# Altium PCB 1700-0002_InterfaceBoard_RevA.PcbDoc (part 1 of 2)
Units mil, origin at the board's own origin, x right, y up, seen from the top; angles counter-clockwise.
Board outline 3850 x 4150 mil, 4 copper layers (Top, GND+Signal, PWR+Signal, Bottom), stack 69.687 mil thick; 247 components, 140 nets, 790 pads, 277 vias.
Unrouted connection lines stored in the file: 103.
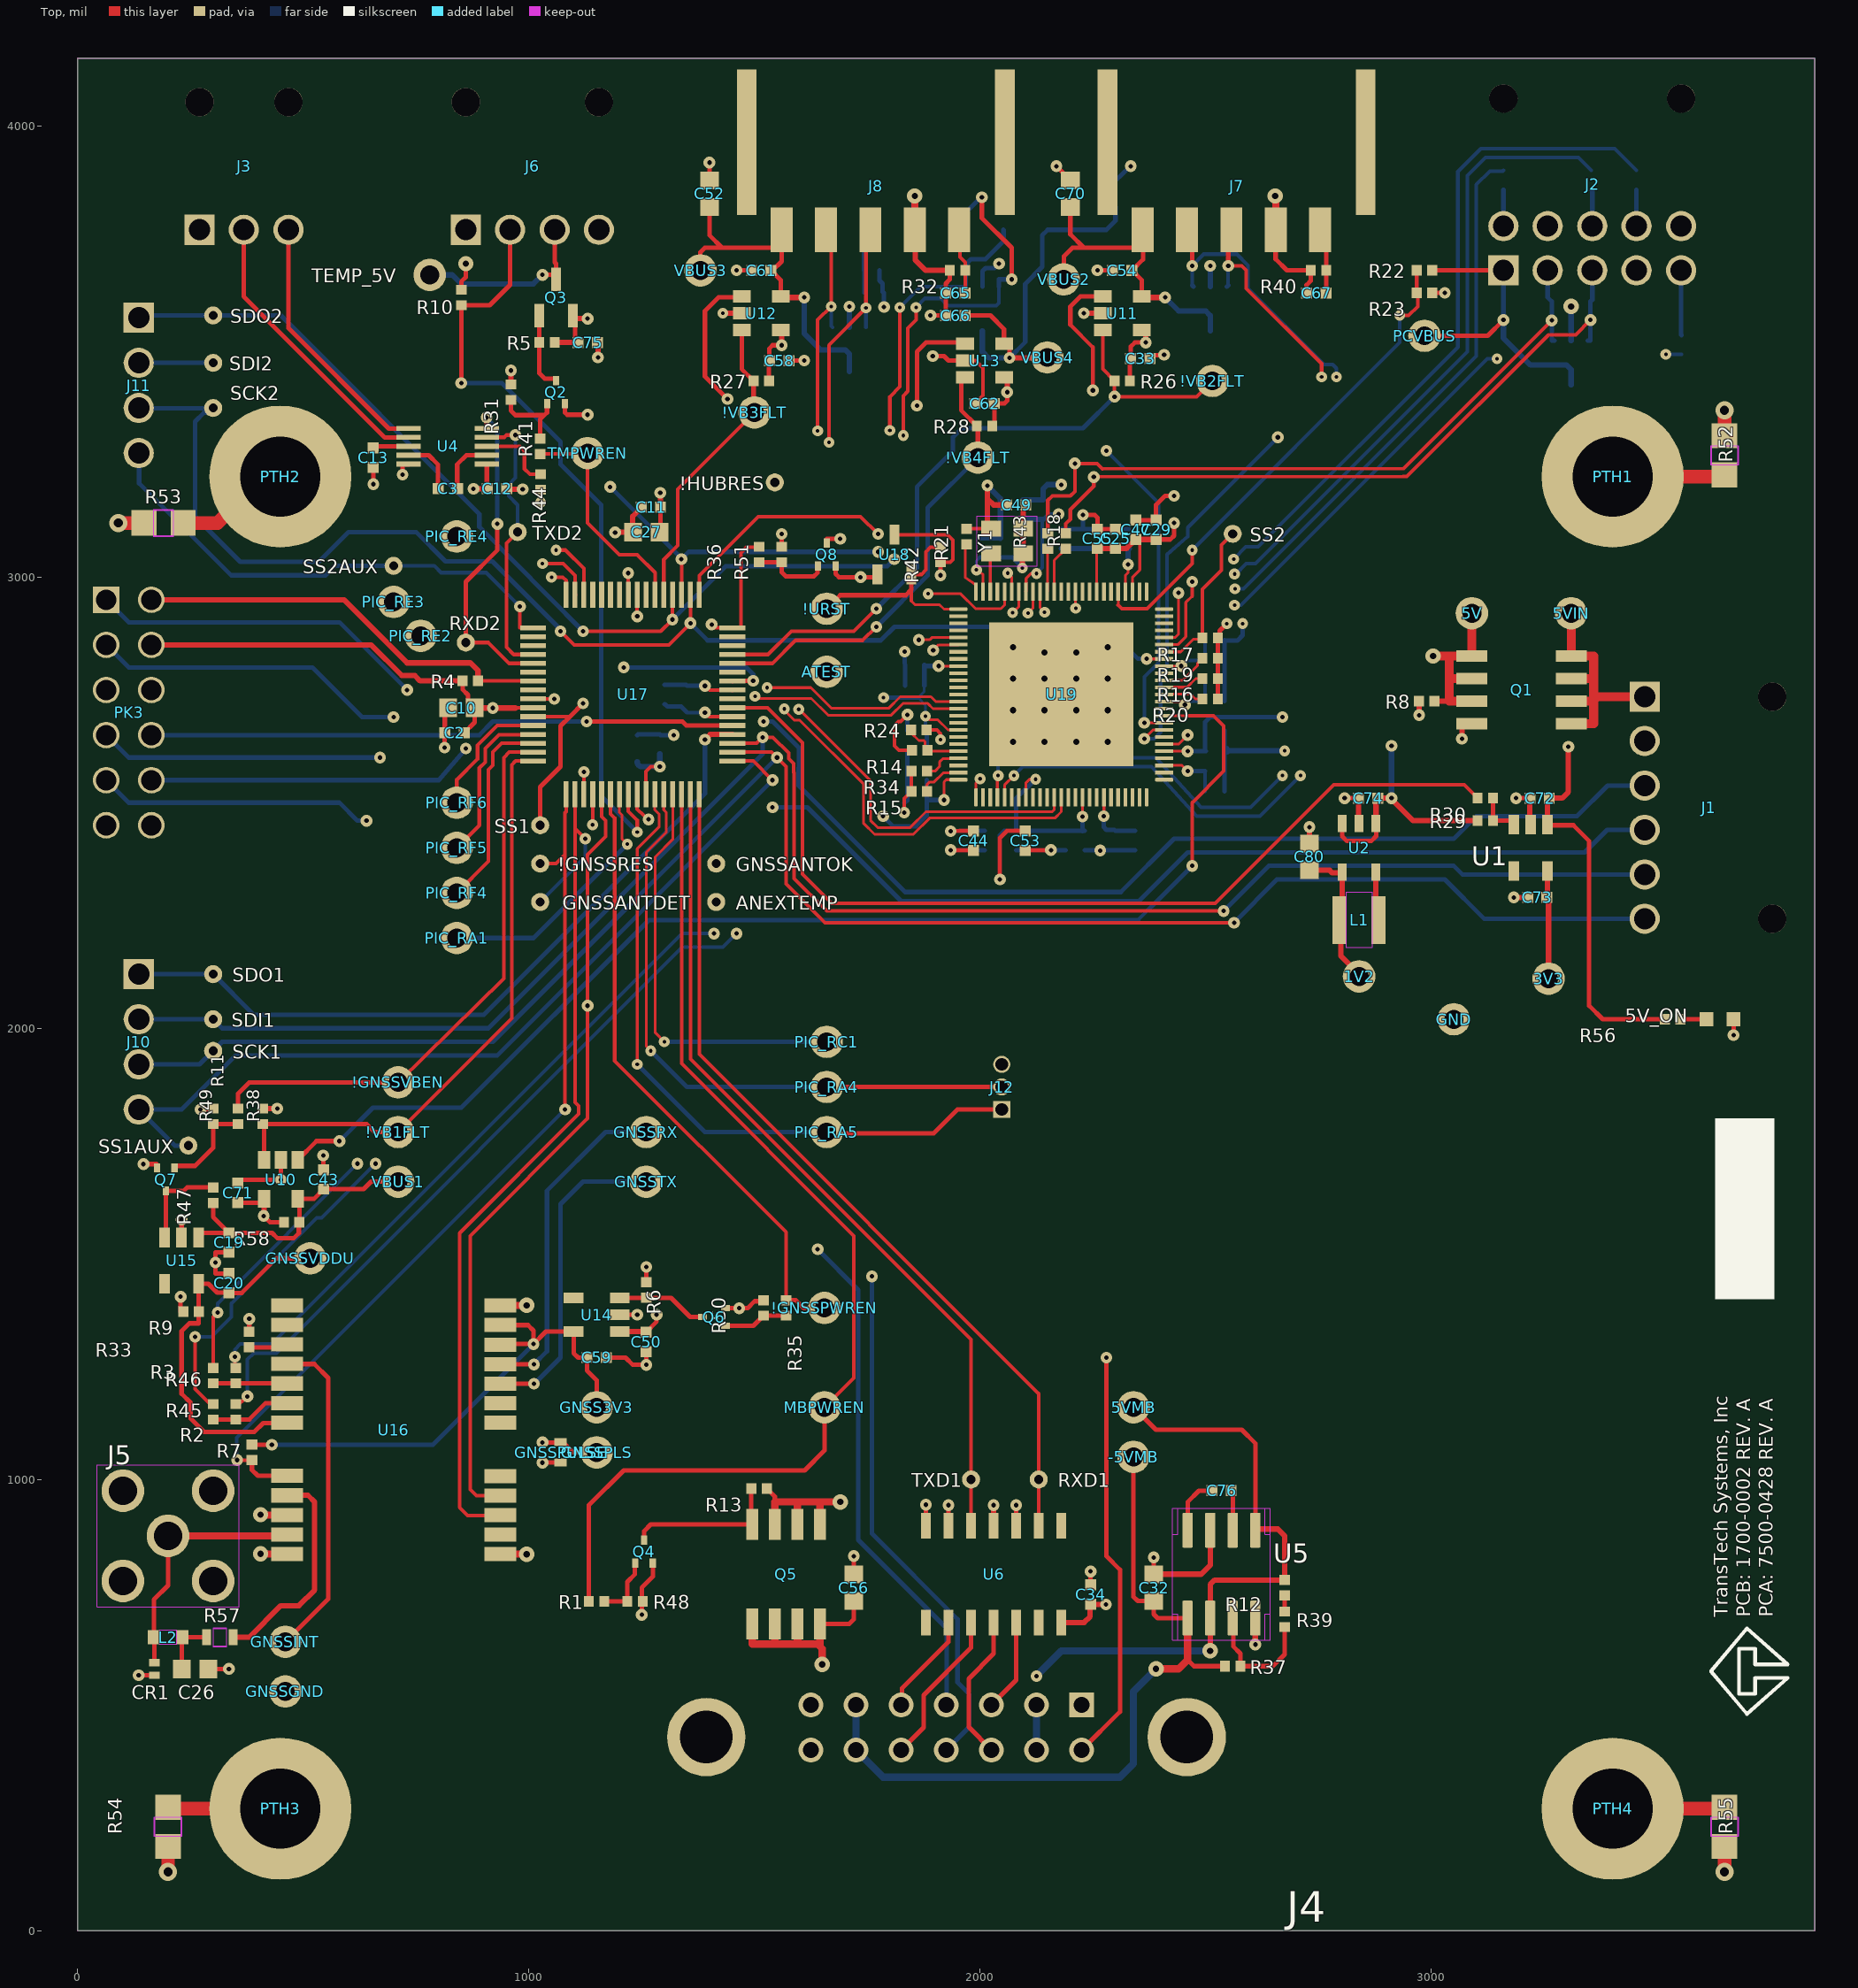
[diagram p0: Top view]
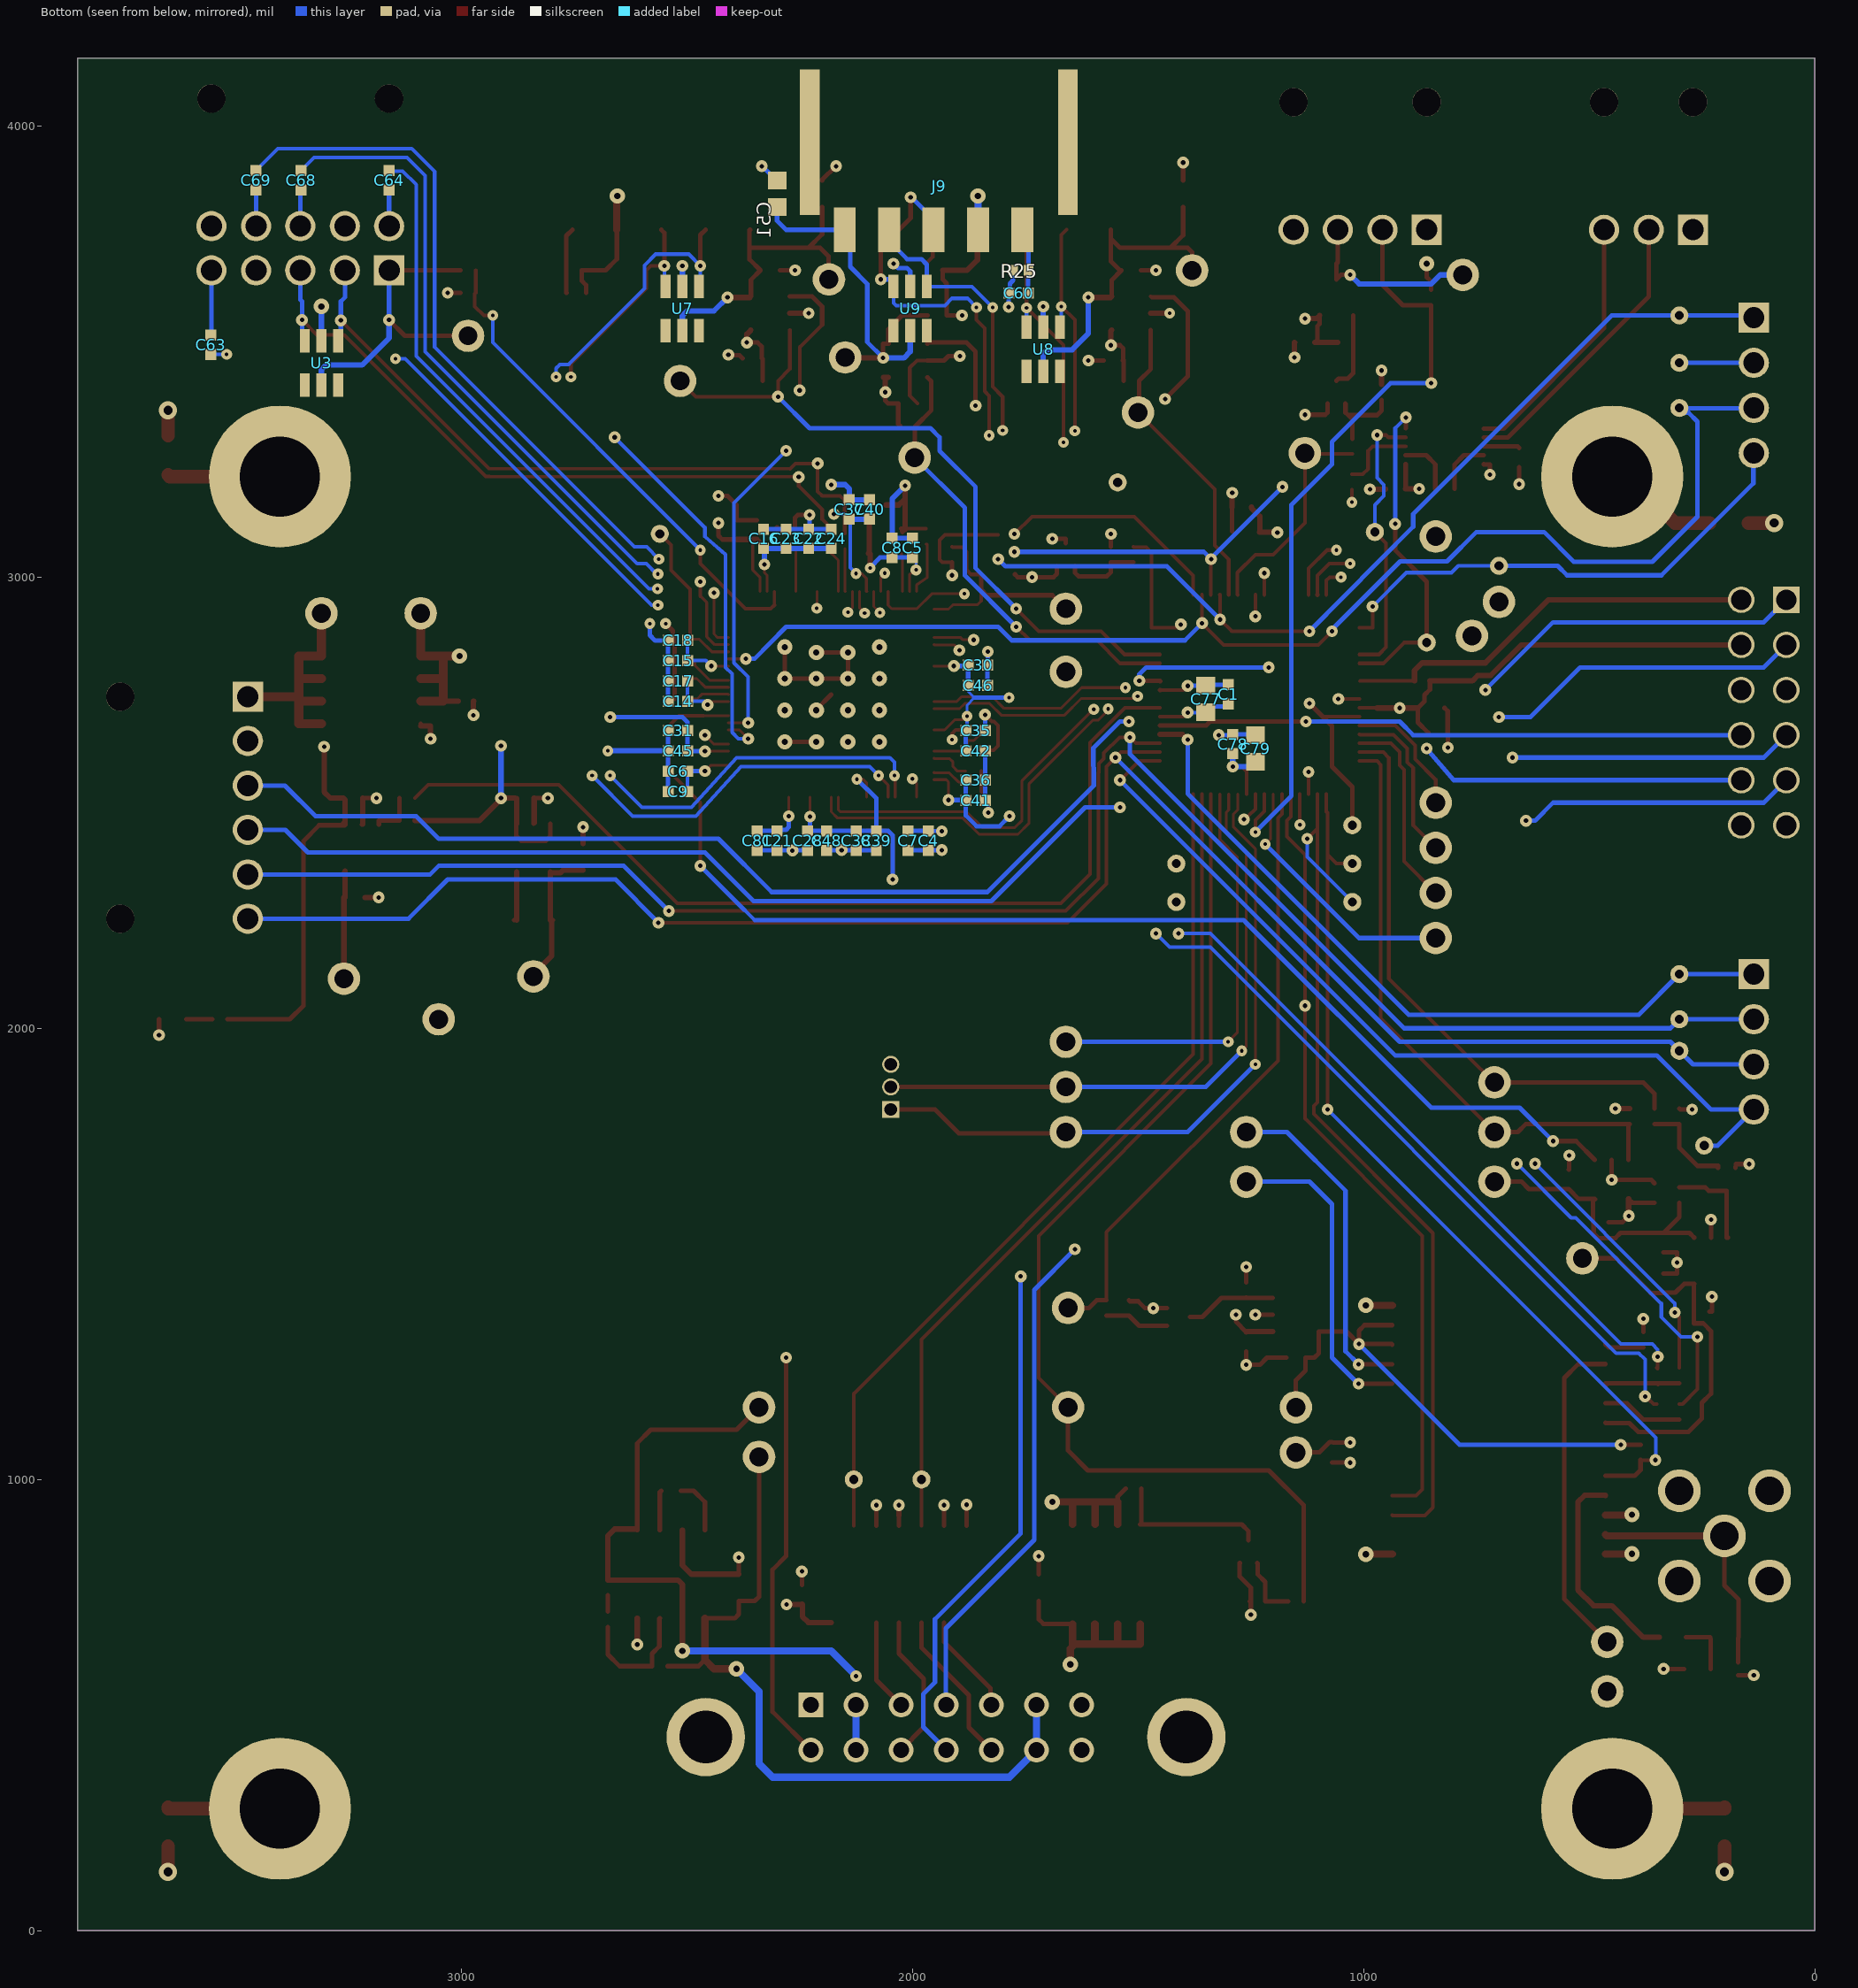
[diagram p1: Bottom view, seen from below]
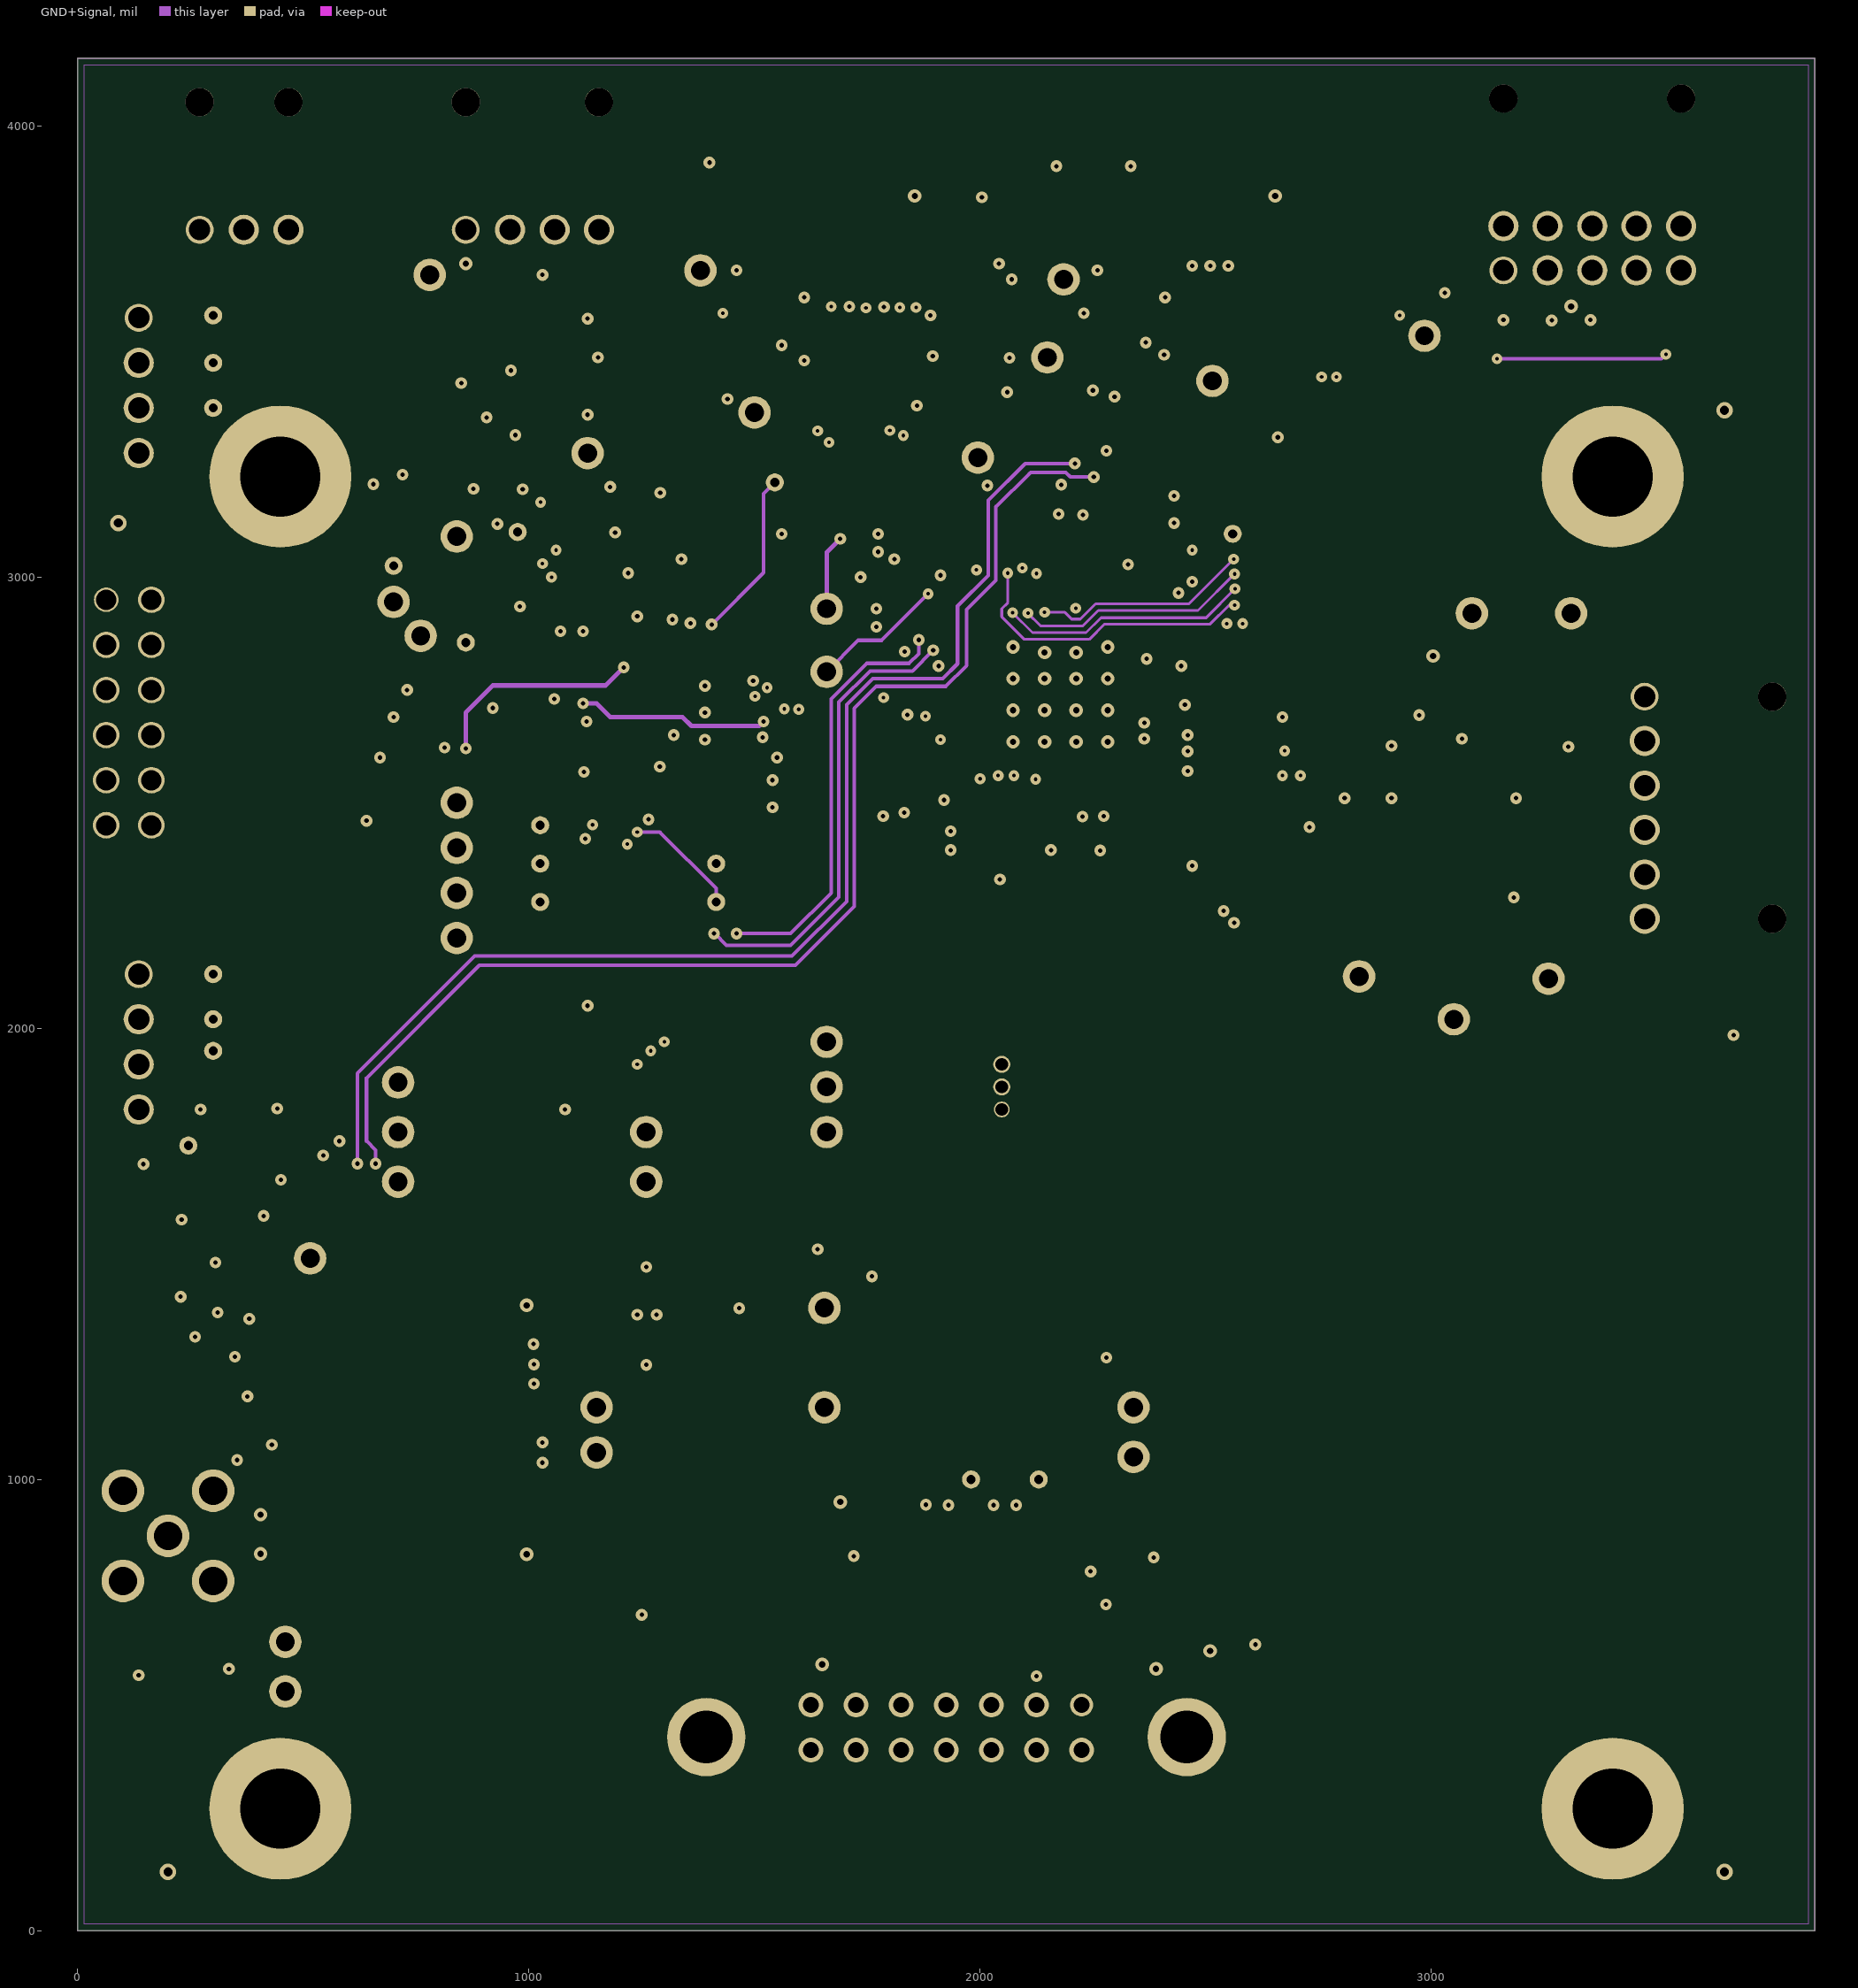
[diagram p2: GND+Signal]
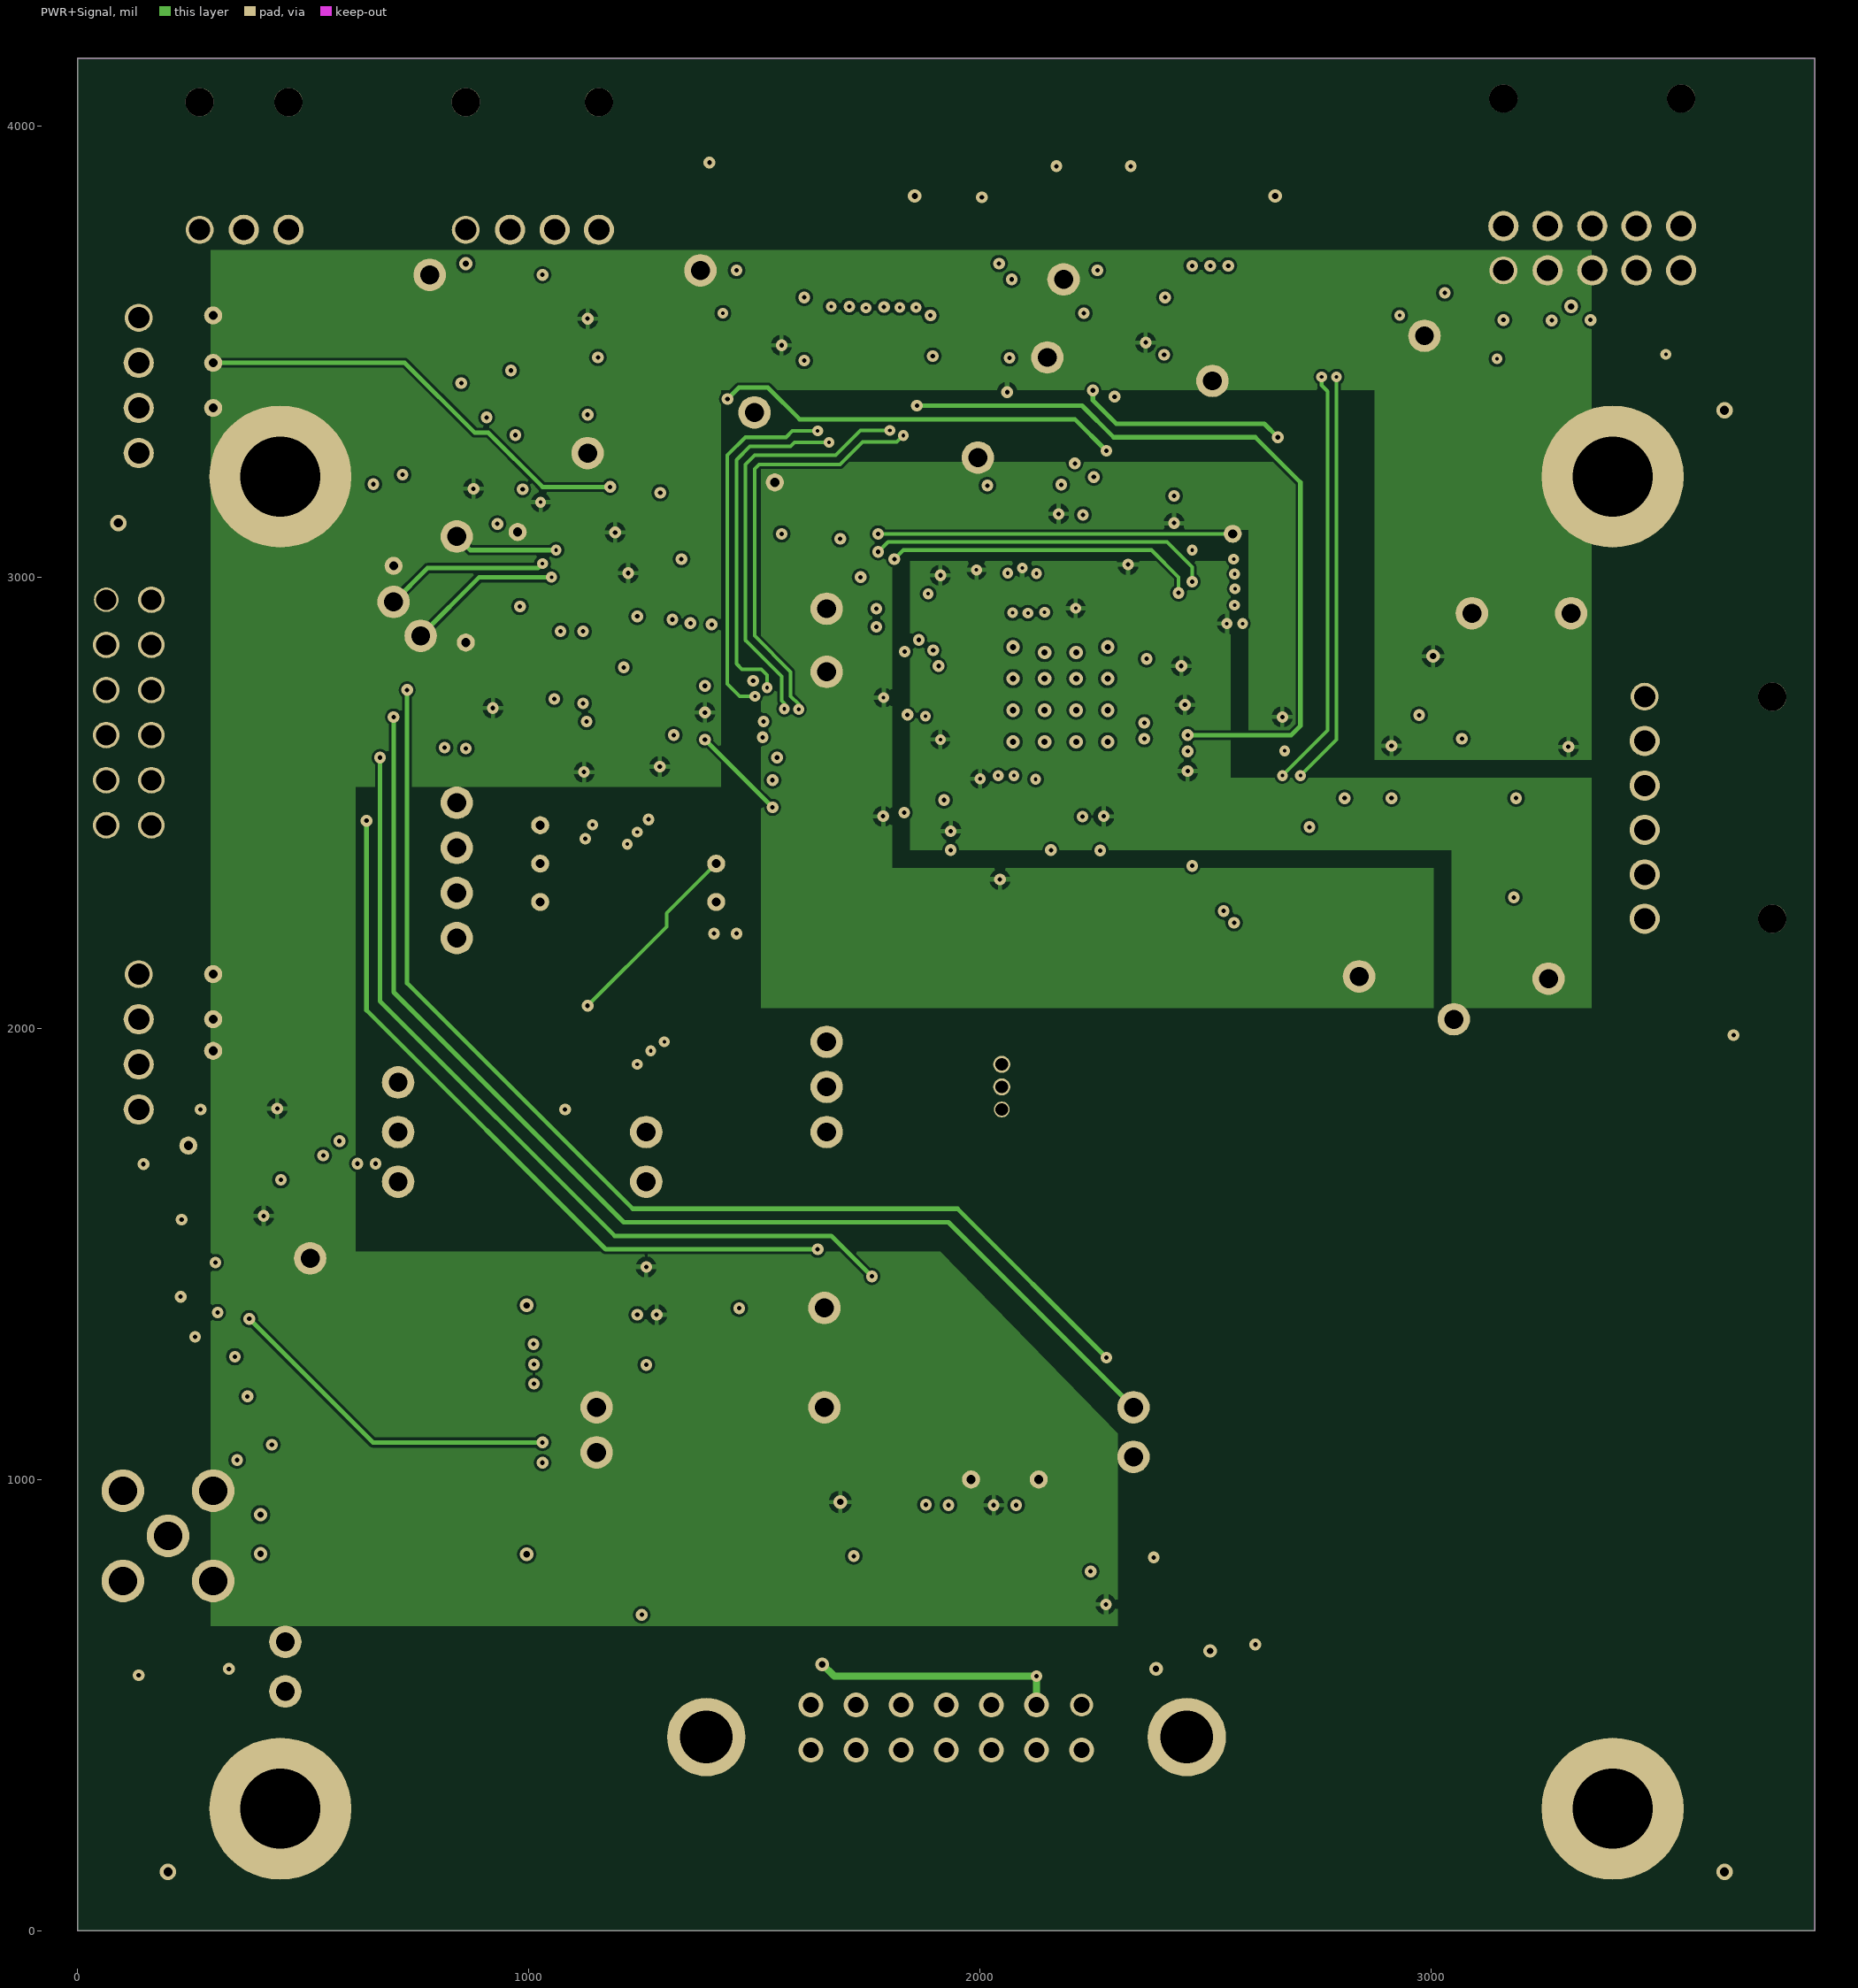
[diagram p3: PWR+Signal]

## Layer stack, top to bottom
Top Solder: solder mask 0.4, Solder Resist, Dk 3.5
Top: signal copper 1.378
Dielectric 1: core 4.3307, FR-4, Dk 4.8
GND+Signal: signal copper 1.378
Dielectric3: prepreg 47.2441, FR-4, Dk 4.8
PWR+Signal: signal copper 1.378
Dielectric2: dielectric 12.6, FR-4, Dk 4.8
Bottom: signal copper 1.378
Bottom Solder: solder mask 0.4, Solder Resist, Dk 3.5

## Board outline
0,4150 0,0 3850,0 3850,4150

## Design rules (kind name [scope] priority, off if disabled: settings)
BoardOutlineClearance mdCopperDimension [All] p1: gap=10 ignorepadtopadclearanceinfootprint=FALSE except(0: Arc-SplitContinuation Track-SplitContinuation SMDPad-SplitContinuation THPad-SplitContinuation Via-SplitContinuation Fill-SplitContinuation Poly-SplitContinuation Region-SplitContinuation Text-SplitContinuation; 20: Poly-OutlineEdge Poly-CavityEdge Poly-CutoutEdge Poly-SplitBarrior)
Clearance Clearance_for_PolygonClass_Isolate_2 [InPolygonClass('Isolate_2') vs IsArc Or IsTrack Or IsPad Or IsVia Or IsFill Or IsRegion Or IsText] p1: gap=2 ignorepadtopadclearanceinfootprint=FALSE
Clearance "Clearance (Same Net)" [All] p2: gap=6 ignorepadtopadclearanceinfootprint=FALSE
Clearance [All] p3: gap=6 ignorepadtopadclearanceinfootprint=FALSE
HoleSize [All] p1: absolutevalues=TRUE maxlimit=100000 minlimit=8 maxpercent=80.000 minpercent=20.000
HoleToHoleClearance mdDrill [All] p1: gap=10 allowstackedmicrovias=TRUE
MinimumSolderMaskSliver [All] p1 off: minsoldermaskwidth=10
PasteMaskExpansion Expansion_SMDPaste_OFF [InPadClass('SMDPaste_OFF')] p1: expansion=0
PasteMaskExpansion mlMinCreamFrame [All] p2: expansion=0
PolygonConnect PolygonConnect_For_PolygonThermal_ON_Width100000_Gap100000 [InPolygonClass('PolygonThermal_ON_Width100000_Gap100000')] p1: connectstyle=Relief reliefconductorwidth=10 reliefentries=4 polygonreliefangle="90 Angle" airgapwidth=10
PolygonConnect PolygonConnect_For_PolygonThermal_ON_Width120000_Gap100000 [InPolygonClass('PolygonThermal_ON_Width120000_Gap100000')] p2: connectstyle=Relief reliefconductorwidth=12 reliefentries=4 polygonreliefangle="90 Angle" airgapwidth=10
PolygonConnect ThermalVias [IsVia] p3: connectstyle=Relief reliefconductorwidth=10 reliefentries=4 polygonreliefangle="90 Angle" airgapwidth=10
PolygonConnect [All] p4: connectstyle=Relief reliefconductorwidth=10 reliefentries=4 polygonreliefangle="90 Angle" airgapwidth=10
RoutingVias [All] p1: holewidth=8 width=24 viastyle="Through Hole" minholewidth=8 minwidth=24 maxholewidth=100 maxwidth=100
SolderMaskExpansion mlMinStopFrame [All] p1: expansion=2 istentingtop=FALSE
Width [All] p1: maxlimit=10 minlimit=6 preferedwidth=6
26 further rules are at their usual default settings.

## Classes and differential pairs
polygon class PolygonThermal_ON_Width100000_Gap100000: Polygon_1_Net_1.2V Polygon_1_Net_3.3V Polygon_1_Net_5V
polygon class PolygonThermal_ON_Width120000_Gap100000: Polygon_1_Net_GND
polygon class Isolate_2: Polygon_1_Net_GND
pad class SMDPaste_OFF: U19-101

## Components (designator, comment, footprint, x,y, rotation, side; value= is the part's Value field where it differs from the comment)
1V2 "" TST_POINT_PTH_042-OCT 2840,2115 r0 top
3V3 "" TST_POINT_PTH_042-OCT 3260,2110 r0 top
5V "" TST_POINT_PTH_042-OCT 3090,2920 r0 top
5V_ON "" LED_0603_LITE-ON 3640,2020 r180 top
5VIN "" TST_POINT_PTH_042-OCT 3310,2920 r0 top
5VMB "" TST_POINT_PTH_042-OCT 2340,1160 r0 top
!GNSSPWREN "" TST_POINT_PTH_042-OCT 1655,1380 r0 top
!GNSSRES "" TST_POINT_PTH_20X40MIL_2PIN 1025,2365 r0 top
!GNSSVBEN "" TST_POINT_PTH_042-OCT 710,1880 r0 top
!HUBRES "" TST_POINT_PTH_20X40MIL_2PIN 1545,3210 r0 top
!URST "" TST_POINT_PTH_042-OCT 1660,2930 r0 top
!VB1FLT "" TST_POINT_PTH_042-OCT 710,1770 r0 top
!VB2FLT "" TST_POINT_PTH_042-OCT 2515,3435 r0 top
!VB3FLT "" TST_POINT_PTH_042-OCT 1500,3365 r0 top
!VB4FLT "" TST_POINT_PTH_042-OCT 1995,3265 r0 top
-5VMB "" TST_POINT_PTH_042-OCT 2340,1050 r0 top
ANEXTEMP "" TST_POINT_PTH_20X40MIL_2PIN 1415,2280 r0 top
ATEST "" TST_POINT_PTH_042-OCT 1660,2790 r0 top
C1 "" G-155_MUR 1300,2740 r90 bottom
C2 "" G-155_MUR 835,2655 r180 top
C3 "" G-155_MUR 820,3196 r0 top
C4 "" G-155_MUR 1965,2416 r270 bottom
C5 "" G-155_MUR 2000,3065 r90 bottom
C6 "" G-155_MUR 2520,2570 r0 bottom
C7 "" G-155_MUR 2010,2416 r270 bottom
C8 "" G-155_MUR 2045,3065 r90 bottom
C9 "" G-155_MUR 2520,2525 r0 bottom
C10 "" CAP_C1608_TDK 850,2710 r180 top
C11 "" G-155_MUR 1270,3155 r0 top
C12 "" G-155_MUR 929,3196 r0 top
C13 "" G-155_MUR 655,3265 r270 top
C14 "" G-155_MUR 2520,2725 r0 bottom
C15 "" G-155_MUR 2520,2815 r0 bottom
C16 "" G-155_MUR 2330,3085 r90 bottom
C17 "" G-155_MUR 2520,2770 r0 bottom
C18 "" G-155_MUR 2520,2860 r0 bottom
C19 "" G-155_MUR 335,1525 r270 top
C20 "" G-155_MUR 335,1435 r90 top
C21 "" G-155_MUR 2300,2416 r270 bottom
C22 "" G-155_MUR 2230,3085 r90 bottom
C23 "" G-155_MUR 2280,3085 r90 bottom
C24 "" G-155_MUR 2180,3085 r90 bottom
C25 "" G-155_MUR 2300,3085 r90 top
C26 "" CAP_C1608_TDK 260,580 r0 top
C27 "" CAP_C1608_TDK 1260,3100 r0 top
C28 "" G-155_MUR 2232,2416 r270 bottom
C29 "" G-155_MUR 2390,3105 r90 top
C30 "" G-155_MUR 1855,2805 r180 bottom
C31 "" G-155_MUR 2520,2660 r0 bottom
C32 "" CAP_C1608_TDK 2385,760 r90 top
C33 "" G-155_MUR 2355,3485 r0 top
C34 "" G-155_MUR 2245,745 r90 top
C35 "" G-155_MUR 1860,2660 r180 bottom
C36 "" G-155_MUR 1860,2550 r180 bottom
C37 "" G-155_MUR 2140,3150 r90 bottom
C38 "" G-155_MUR 2125,2416 r270 bottom
C39 "" G-155_MUR 2080,2416 r270 bottom
C40 "" G-155_MUR 2095,3150 r90 bottom
C41 "" G-155_MUR 1860,2505 r180 bottom
C42 "" G-155_MUR 1860,2615 r180 bottom
C43 "" G-155_MUR 545,1665 r90 top
C44 "" G-155_MUR 1985,2416 r270 top
C45 "" G-155_MUR 2520,2615 r0 bottom
C46 "" G-155_MUR 1855,2760 r180 bottom
C47 "" G-155_MUR 2345,3105 r90 top
C48 "" G-155_MUR 2190,2416 r270 bottom
C49 "" G-155_MUR 2080,3160 r180 top
C50 "" G-155_MUR 1260,1305 r270 top
C51 "" CAP_C1608_TDK 2300,3850 r90 bottom
C52 "" CAP_C1608_TDK 1400,3850 r90 top
C53 "" G-155_MUR 2100,2416 r270 top
C54 "" G-155_MUR 2315,3680 r180 top
C55 "" G-155_MUR 2260,3085 r90 top
C56 "" CAP_C1608_TDK 1720,760 r90 top
C58 "" G-155_MUR 1555,3480 r0 top
C59 "" G-155_MUR 1150,1270 r0 top
C60 "" G-155_MUR 1765,3630 r180 bottom
C61 "" G-155_MUR 1515,3680 r180 top
C62 "" G-155_MUR 2010,3385 r180 top
C63 "" G-155_MUR 3555,3515 r270 bottom
C64 "" G-155_MUR 3160,3880 r90 bottom
C65 "" G-155_MUR 1945,3630 r0 top
C66 "" G-155_MUR 1945,3580 r180 top
C67 "" G-155_MUR 2745,3630 r0 top
C68 "" G-155_MUR 3355,3880 r90 bottom
C69 "" G-155_MUR 3455,3880 r90 bottom
C70 "" CAP_C1608_TDK 2200,3850 r90 top
C71 "" G-155_MUR 355,1635 r90 top
C72 "" G-155_MUR 3240,2510 r180 top
C73 "" G-155_MUR 3235,2290 r180 top
C74 "" G-155_MUR 2860,2510 r180 top
C75 "" G-155_MUR 1130,3520 r0 top
C76 "" G-155_MUR 2535,975 r180 top
C77 "" CAP_C1608_TDK 1350,2730 r90 bottom
C78 "" G-155_MUR 1290,2630 r90 bottom
C79 "" CAP_C1608_TDK 1240,2620 r90 bottom
C80 "" CAP_C1608_TDK 2730,2380 r90 top
C81 "" G-155_MUR 2344,2416 r270 bottom
CR1 "" SOD-923F_COMCHIP 170,580 r270 top
GND "" TST_POINT_PTH_042-OCT 3050,2020 r0 top
GNSS3V3 "" TST_POINT_PTH_042-OCT 1150,1160 r0 top
GNSSANTDET "" TST_POINT_PTH_20X40MIL_2PIN 1025,2280 r0 top
GNSSANTOK "" TST_POINT_PTH_20X40MIL_2PIN 1415,2365 r0 top
GNSSGND "" TST_POINT_PTH_042-OCT 460,530 r0 top
GNSSINT "" TST_POINT_PTH_042-OCT 460,640 r0 top
GNSSPLS "" TST_POINT_PTH_042-OCT 1150,1060 r0 top
GNSSPULSE "" LED_DIALIGHT_598_DIA 1070,1060 r90 top
GNSSRX "" TST_POINT_PTH_042-OCT 1260,1770 r0 top
GNSSTX "" TST_POINT_PTH_042-OCT 1260,1660 r0 top
GNSSVDDU "" TST_POINT_PTH_042-OCT 515,1490 r0 top
J1 "" CON_1053131306 3473,2735 r90 top
J2 "" CON_1053141310 3160,3680 r180 top
J3 "" CON_1053131303 270,3770 r180 top
J4 "" 3M_N3314-5302RB_RA 1925,450 r180 top
J5 "" SAMTEC_SMA-J-P-X-ST-TH1 200,875 r0 top
J6 "" CON_1053131304 860,3770 r180 top
J7 "" CON_1054301305_MOL 2360,3770 r180 top
J8 "" CON_1054301305_MOL 1560,3770 r180 top
J9 "" CON_1054301305_MOL 2150,3770 r0 bottom
J10 "" MOLEX_VERT-HDR_171861004 135,1970 r270 top
J11 "" MOLEX_VERT-HDR_171861004 135,3425 r270 top
J12 "" CONN_GRPB031VWVN-RC_SUL 2048,1820 r90 top
L1 "" IND_TAIYO_NR3012_TAY 2840,2240 r0 top
L2 "" INDUCTOR_0603_TDK 200,650 r0 top
MBPWREN "" TST_POINT_PTH_042-OCT 1655,1160 r0 top
PCVBUS "" TST_POINT_PTH_042-OCT 2985,3535 r0 top
PIC_RA1 "" TST_POINT_PTH_042-OCT 840,2200 r0 top
PIC_RA4 "" TST_POINT_PTH_042-OCT 1660,1870 r0 top
PIC_RA5 "" TST_POINT_PTH_042-OCT 1660,1770 r0 top
PIC_RC1 "" TST_POINT_PTH_042-OCT 1660,1970 r0 top
PIC_RE2 "" TST_POINT_PTH_042-OCT 760,2870 r0 top
PIC_RE3 "" TST_POINT_PTH_042-OCT 700,2945 r0 top
PIC_RE4 "" TST_POINT_PTH_042-OCT 840,3090 r0 top
PIC_RF4 "" TST_POINT_PTH_042-OCT 840,2300 r0 top
PIC_RF5 "" TST_POINT_PTH_042-OCT 840,2400 r0 top
PIC_RF6 "" TST_POINT_PTH_042-OCT 840,2500 r0 top
PK3 "" CON_901311086_MOL 63,2950 r270 top
PTH1 "" PTH_M4_4.5MM-ID 3402,3223 r0 top
PTH2 "" PTH_M4_4.5MM-ID 449,3223 r0 top
PTH3 "" PTH_M4_4.5MM-ID 449,270 r0 top
PTH4 "" PTH_M4_4.5MM-ID 3402,270 r0 top
Q1 "" SO-8L-NB_FAS 3200,2750 r0 top
Q2 "" SC-75(SOT-416)_ONSEMI 1060,3410 r0 top
Q3 "" SOT_1CDS-T1-BE3_VIS 1060,3620 r0 top
Q4 "" SC-75(SOT-416)_ONSEMI 1255,840 r0 top
Q5 "" SO-8L-NB_FAS 1570,790 r270 top
Q6 "" SC-75(SOT-416)_ONSEMI 1410,1360 r90 top
Q7 "" SC-75(SOT-416)_ONSEMI 195,1665 r180 top
Q8 "" SC-75(SOT-416)_ONSEMI 1660,3050 r0 top
R1 "" RESC1005X35N 1150,730 r0 top
R2 "" RESC1005X35N 350,1150 r90 top
R3 "" RESC1005X35N 350,1230 r90 top
R4 "" RESC1005X35N 870,2770 r0 top
R5 "" RESC1005X35N 1040,3520 r0 top
R6 "" RESC1005X35N 1260,1420 r90 top
R7 "" RESC1005X35N 386,1060 r90 top
R8 "" RESC1005X35N 2990,2725 r0 top
R9 "" RESC1005X35N 251,1372 r180 top
R10 "" RESC1005X35N 850,3620 r90 top
R11 "" RESC1005X35N 355,1805 r270 top
R12 "" RESC1005X35N 2675,760 r90 top
R13 "" RESC1005X35N 1510,980 r180 top
R14 "" RESC1005X35N 1866,2616 r180 top
R15 "" RESC1005X35N 1865,2525 r180 top
R16 "" RESC1005X35N 2510,2775 r180 top
R17 "" RESC1005X35N 2510,2865 r180 top
R18 "" RESC1005X35N 2190,3080 r90 top
R19 "" RESC1005X35N 2510,2820 r180 top
R20 "" RESC1005X35N 2510,2730 r180 top
R21 "" RESC1005X35N 1970,3090 r270 top
R22 "" RESC1005X35N 2985,3680 r0 top
R23 "" RESC1005X35N 2985,3630 r180 top
R24 "" RESC1005X35N 1864,2661 r180 top
R25 "" RESC1005X35N 1760,3680 r0 bottom
R26 "" RESC1005X35N 2315,3435 r0 top
R27 "" RESC1005X35N 1515,3435 r0 top
R28 "" RESC1005X35N 2010,3335 r0 top
R29 "" RESC1005X35N 3120,2460 r0 top
R30 "" RESC1005X35N 3120,2510 r180 top
R31 "" RESC1005X35N 960,3410 r90 top
R32 "" RESC1005X35N 1950,3680 r180 top
R33 "" RESC1005X35N 380,1310 r90 top
R34 "" RESC1005X35N 1865,2570 r180 top
R35 "" RESC1005X35N 1570,1380 r270 top
R36 "" RESC1005X35N 1510,3050 r270 top
R37 "" RESC1005X35N 2560,586 r180 top
R38 "" RESC1005X35N 410,1805 r90 top
R39 "" RESC1005X35N 2675,690 r270 top
R40 "" RESC1005X35N 2750,3680 r180 top
R41 "" RESC1005X35N 1025,3290 r270 top
R42 "" RESC1005X35N 1912,3050 r90 top
R43 "" RESC1005X35N 2150,3080 r90 top
R44 "" RESC1005X35N 1026,3211 r270 top
R45 "" RESC1005X35N 300,1150 r90 top
R46 "" RESC1005X35N 300,1230 r90 top
R47 "" RESC1005X35N 300,1630 r90 top
R48 "" RESC1005X35N 1235,730 r0 top
R49 "" RESC1005X35N 300,1805 r90 top
R50 "" RESC1005X35N 1520,1380 r90 top
R51 "" RESC1005X35N 1560,3050 r90 top
R52 "" STA_HCJ0805_STP 3650,3270 r270 top
R53 "" STA_HCJ0805_STP 190,3120 r0 top
R54 "" STA_HCJ0805_STP 200,230 r90 top
R55 "" STA_HCJ0805_STP 3650,230 r90 top
R56 "" RESC1005X35N 3535,2020 r180 top
R57 "" STA_RMCF0603_STP 315,650 r0 top
R58 "" RESC1005X35N 474,1570 r0 top
RXD1 "" TST_POINT_PTH_20X40MIL_2PIN 2130,1000 r0 top
RXD2 "" TST_POINT_PTH_20X40MIL_2PIN 860,2855 r0 top
SCK1 "" TST_POINT_PTH_20X40MIL_2PIN 300,1950 r0 top
SCK2 "" TST_POINT_PTH_20X40MIL_2PIN 300,3375 r0 top
SDI1 "" TST_POINT_PTH_20X40MIL_2PIN 300,2020 r0 top
SDI2 "" TST_POINT_PTH_20X40MIL_2PIN 300,3475 r0 top
SDO1 "" TST_POINT_PTH_20X40MIL_2PIN 300,2120 r0 top
SDO2 "" TST_POINT_PTH_20X40MIL_2PIN 300,3580 r0 top
SS1 "" TST_POINT_PTH_20X40MIL_2PIN 1025,2450 r0 top
SS1AUX "" TST_POINT_PTH_20X40MIL_2PIN 245,1740 r0 top
SS2 "" TST_POINT_PTH_20X40MIL_2PIN 2560,3096 r0 top
SS2AUX "" TST_POINT_PTH_20X40MIL_2PIN 700,3025 r0 top
TEMP_5V "" TST_POINT_PTH_042-OCT 780,3670 r0 top
TMPWREN "" TST_POINT_PTH_042-OCT 1130,3275 r0 top
TXD1 "" TST_POINT_PTH_20X40MIL_2PIN 1980,1000 r0 top
TXD2 "" TST_POINT_PTH_20X40MIL_2PIN 975,3100 r0 top
U1 "" DBV0005A_L 3220,2400 r270 top
U2 "" DBV5_TEX 2840,2400 r270 top
U3 "" SOT-23-6_AOS 3310,3475 r270 bottom
U4 "" 21-0061L_MXM 820,3290 r180 top
U5 "" SOIC127P600X175-8N 2535,790 r270 top
U6 "" 21-0041B_14_MXM 2030,790 r270 top
U7 "" SOT-23-6_AOS 2510,3595 r270 bottom
U8 "" SOT-23-6_AOS 1710,3505 r270 bottom
U9 "" SOT-23-6_AOS 2005,3595 r270 bottom
U10 "" TSOT-25_DIODES-INC 450,1665 r270 top
U11 "" TSOT-25_DIODES-INC 2315,3585 r0 top
U12 "" TSOT-25_DIODES-INC 1515,3585 r0 top
U13 "" TSOT-25_DIODES-INC 2010,3480 r0 top
U14 "" DBV0005A_L 1150,1365 r180 top
U15 "" DBV0005A_L 230,1485 r270 top
U16 "" UBLOX_24LCC 700,1110 r180 top
U17 "" TQFP64_10X10MC_MCH 1230,2740 r0 top
U18 "" SOT-23_M3_MCH 1810,3050 r0 top
U19 "" VQFN100_KDX_MCH 2180,2740 r0 top
VBUS1 "" TST_POINT_PTH_042-OCT 710,1660 r0 top
VBUS2 "" TST_POINT_PTH_042-OCT 2185,3660 r0 top
VBUS3 "" TST_POINT_PTH_042-OCT 1380,3680 r0 top
VBUS4 "" TST_POINT_PTH_042-OCT 2149,3487 r0 top
Y1 "" OSC_ECS-2033-250-BN 2060,3080 r180 top

## Footprints (in the part's own frame and the unit in brackets; to place one, negate y for a bottom-side part, rotate by r counter-clockwise, add the part's x,y. Pads: shape width x height; smd on the part's side, far side on the other; paste and mask are expansions set on the pad)
3M_N3314-5302RB_RA [mil] "3M_N3314-5302RB_RA"
  rect 55x55 / inner round 50.81 / far side rect 55x55 hole 35: 1(-300,-50)
  round 55 hole 35: 2(-300,50) 3(-200,-50) 4(-200,50) 5(-100,-50) 6(-100,50) 7(0,-50) 8(0,50) 9(100,-50) 10(100,50) 11(200,-50) 12(200,50) 13(300,-50) 14(300,50)
  round 174 hole 116: 15(-533,21) 16(532,21)
21-0041B_14_MXM [mil] "21-0041B_14_MXM"
  rect 57.5x21 smd: 1(-107.25,150) 2(-107.25,100) 3(-107.25,50) 4(-107.25,0) 5(-107.25,-50) 6(-107.25,-100) 7(-107.25,-150) 8(107.25,-150) 9(107.25,-100) 10(107.25,-50) 11(107.25,0) 12(107.25,50) 13(107.25,100) 14(107.25,150)
21-0061L_MXM [mil] "21-0061L_MXM"
  rect 53.5x11 smd: 1(-86.75,39.37) 2(-86.75,19.69) 3(-86.75,0) 4(-86.75,-19.69) 5(-86.75,-39.37) 6(86.75,-39.37) 7(86.75,-19.69) 8(86.75,0) 9(86.75,19.69) 10(86.75,39.37)
CAP_C1608_TDK [mm] "CAP_C1608_TDK"
  rect 1x1.05 smd: 1(-0.75,0) 2(0.75,0)
CON_901311086_MOL [mil] "CON_901311086_MOL"
  rect 59x59 / inner round 54.51 / far side rect 59x59 hole 45: 1(0,0)
  round 59 hole 45: 2(0,100) 3(100,0) 4(100,100) 5(200,0) 6(200,100) 7(300,0) 8(300,100) 9(400,0) 10(400,100) 11(500,0) 12(500,100)
CON_1053131303 [mil] "CON_1053131303"
  rect 67x67 / inner round 61.9 / far side rect 67x67 hole 47: 1(0,0)
  round 67 hole 47: 2(-98,0) 3(-197,0)
  round 63 hole 63: 4(0,-283) 5(-197,-283)
CON_1053131304 [mil] "CON_1053131304"
  rect 67x67 / inner round 61.9 / far side rect 67x67 hole 47: 1(0,0)
  round 67 hole 47: 2(-98,0) 3(-197,0) 4(-295,0)
  round 63 hole 63: 5(0,-283) 6(-295,-283)
CON_1053131306 [mil] "CON_1053131306"
  rect 67x67 / inner round 61.9 / far side rect 67x67 hole 47: 1(0,0)
  round 67 hole 47: 2(-98,0) 3(-197,0) 4(-295,0) 5(-394,0) 6(-492,0)
  round 63 hole 63: 7(0,-283) 8(-492,-283)
CON_1053141310 [mil] "CON_1053141310"
  rect 67x67 / inner round 61.9 / far side rect 67x67 hole 47: 1(0,0)
  round 67 hole 47: 2(-98,0) 3(-197,0) 4(-295,0) 5(-394,0) 6(0,-98) 7(-98,-98) 8(-197,-98) 9(-295,-98) 10(-394,-98)
  round 63 hole 63: 11(0,-381) 12(-394,-381)
CON_1054301305_MOL [mm] "CON_1054301305_MOL"
  rect 1.24x2.5 smd: 1(0,0) 2(-2.5,0) 3(-5,0) 4(-7.5,0) 5(-10,0)
  rect 1.1x8.2 smd: 6(1.97,-4.93) 7(-12.57,-4.93)
CONN_GRPB031VWVN-RC_SUL [mil] "CONN_GRPB031VWVN-RC_SUL"
  rect 38x38 / inner round 35.11 / far side rect 38x38 hole 28: 1(0,0)
  round 38 hole 28: 2(50,0) 3(100,0)
DBV5_TEX [mil] "DBV5_TEX"
  rect 38.5x20 smd: 1(-53.75,37.4) 2(-53.75,0) 3(-53.75,-37.4) 4(53.75,-37.4) 5(53.75,37.4)
DBV0005A_L [mil] "DBV0005A_L"
  rect 43.31x23.62 smd: 1(-51.18,37.4) 2(-51.18,0) 3(-51.18,-37.4) 4(51.18,-37.4) 5(51.18,37.4)
G-155_MUR [mm] "G-155_MUR"
  rect 0.62x0.62 smd: 1(-0.546,0) 2(0.546,0)
IND_TAIYO_NR3012_TAY [mil] "IND_TAIYO_NR3012_TAY"
  rect 31.5x106 smd: 1(-43.25,0) 2(43.25,0)
  Top keep-out region: -28.5,62 28.5,62 28.5,-62 -28.5,-62
INDUCTOR_0603_TDK [mil] "INDUCTOR_0603_TDK"
  rect 27.56x31.5 smd: 1(-31.5,0) 2(31.5,0)
  Top keep-out region: -18,16 18,16 18,-16 -18,-16
LED_0603_LITE-ON [mil] "LED_0603_LITE-ON"
  rect 31x31 smd: 1(-30,0) 2(30,0)
LED_DIALIGHT_598_DIA [mil] "LED_DIALIGHT_598_DIA"
  rect 17.5x28 smd: 1(-22.75,0) 2(22.75,0)
MOLEX_VERT-HDR_171861004 [mil] "MOLEX_VERT-HDR_171861004"
  rect 67x67 / inner round 61.9 / far side rect 67x67 hole 47: 1(-150,0)
  round 67 hole 47: 2(-50,0) 3(50,0) 4(150,0)
OSC_ECS-2033-250-BN [mil] "OSC_ECS-2033-250-BN"
  rect 43.31x35.43 smd: 1(-35.43,-27.56) 2(35.43,-27.56) 3(35.43,27.56) 4(-35.43,27.56)
  Top keep-out lines w1.97: 66.93,55.12 66.93,-55.12 -66.93,-55.12 -66.93,55.12 66.93,55.12
PTH_M4_4.5MM-ID [mm] "PTH_M4_4.5MM-ID"
  round 8 hole 4.5: P$1(0,0)
RESC1005X35N [mil] "RESC1005X35N"
  rect 22.05x23.62 smd: 1(-17.13,0) 2(17.13,0)
SAMTEC_SMA-J-P-X-ST-TH1 [mil] "SAMTEC_SMA-J-P-X-ST-TH1"
  round 94.48 hole 62.99: 1(0,0) 2(100,-100) 3(100,100) 4(-100,100) 5(-100,-100)
  Top keep-out lines w1.97: -157.48,-157.48 -157.48,157.48 157.48,157.48 157.48,-157.48 -157.48,-157.48
SC-75(SOT-416)_ONSEMI [mil] "SC-75(SOT-416)_ONSEMI"
  rect 14x20 smd: 1(-19.5,-25.5) 2(19.5,-25.5) 3(0,25.5)
SO-8L-NB_FAS [mil] "SO-8L-NB_FAS"
  rect 69x26 smd: 1(-110.24,75) 2(-110.24,25) 3(-110.24,-25) 4(-110.24,-75) 5(110.24,-75) 6(110.24,-25) 7(110.24,25) 8(110.24,75)
SOD-923F_COMCHIP [mil] "SOD-923F_COMCHIP"
  rect 16x24 smd: 1(-14,0) 2(14,0)
SOIC127P600X175-8N [mil] "SOIC127P600X175-8N"
  rrect25% 77.56x23.23 smd: 1(-97.44,75) 2(-97.44,25) 3(-97.44,-25) 4(-97.44,-75) 5(97.44,-75) 6(97.44,-25) 7(97.44,25) 8(97.44,75)
  Top keep-out lines w1.97: 88.58,-108.27 -88.58,-108.27 ; 88.58,-108.27 88.58,-96.85 146.06,-96.85 ; 88.58,-108.27 146.06,-108.27 146.06,-96.85 ; -88.58,-108.27 -88.58,-96.85 -146.06,-96.85 ; -88.58,-108.27 -146.06,-108.27 -146.06,-96.85 ; 146.06,-96.85 146.06,96.85 ; -146.06,-96.85 -146.06,96.85 ; 146.06,96.85 88.58,96.85 88.58,108.27 ; 146.06,96.85 146.06,108.27 88.58,108.27 ; -146.06,96.85 -88.58,96.85 -88.58,108.27 ; -146.06,96.85 -146.06,108.27 -88.58,108.27 ; 88.58,108.27 -88.58,108.27
SOT-23-6_AOS [mil] "SOT-23-6_AOS"
  rect 52x22 smd: 1(-49,37) 2(-49,0) 3(-49,-37) 4(49,-37) 5(49,0) 6(49,37)
SOT-23_M3_MCH [mil] "SOT-23_M3_MCH"
  rect 22x44 smd: 1(-37.4,-44) 2(37.4,-44) 3(0,44)
SOT_1CDS-T1-BE3_VIS [mil] "SOT_1CDS-T1-BE3_VIS"
  rect 22x52 smd: 1(-37.4,-40) 2(37.4,-40) 3(0,40)
STA_HCJ0805_STP [mil] "STA_HCJ0805_STP"
  rect 55.12x56.69 smd: 1(-43.31,0) 2(43.31,0)
  Top keep-out region: -21.5,28.5 21.5,28.5 21.5,-28.5 -21.5,-28.5
  Top keep-out region: -21.5,30.5 21.5,30.5 21.5,-30.5 -21.5,-30.5
STA_RMCF0603_STP [mil] "STA_RMCF0603_STP"
  rect 19.69x35.43 smd: 1(-29.53,0) 2(29.53,0)
  Top keep-out region: -14.5,19.5 14.5,19.5 14.5,-19.5 -14.5,-19.5
  Top keep-out region: -14.5,21.5 14.5,21.5 14.5,-21.5 -14.5,-21.5
TQFP64_10X10MC_MCH [mil] "TQFP64_10X10MC_MCH"
  rect 57.56x11 smd: 1(-221,147.64) 2(-221,127.95) 3(-221,108.27) 4(-221,88.58) 5(-221,68.9) 6(-221,49.21) 7(-221,29.53) 8(-221,9.84) 9(-221,-9.84) 10(-221,-29.53) 11(-221,-49.21) 12(-221,-68.9) 13(-221,-88.58) 14(-221,-108.27) 15(-221,-127.95) 16(-221,-147.64) 33(221,-147.64) 34(221,-127.95) 35(221,-108.27) 36(221,-88.58) 37(221,-68.9) 38(221,-49.21) 39(221,-29.53) 40(221,-9.84) 41(221,9.84) 42(221,29.53) 43(221,49.21) 44(221,68.9) 45(221,88.58) 46(221,108.27) 47(221,127.95) 48(221,147.64)
  rect 11x57.56 smd: 17(-147.64,-221) 18(-127.95,-221) 19(-108.27,-221) 20(-88.58,-221) 21(-68.9,-221) 22(-49.21,-221) 23(-29.53,-221) 24(-9.84,-221) 25(9.84,-221) 26(29.53,-221) 27(49.21,-221) 28(68.9,-221) 29(88.58,-221) 30(108.27,-221) 31(127.95,-221) 32(147.64,-221) 49(147.64,221) 50(127.95,221) 51(108.27,221) 52(88.58,221) 53(68.9,221) 54(49.21,221) 55(29.53,221) 56(9.84,221) 57(-9.84,221) 58(-29.53,221) 59(-49.21,221) 60(-68.9,221) 61(-88.58,221) 62(-108.27,221) 63(-127.95,221) 64(-147.64,221)
TSOT-25_DIODES-INC [mm] "TSOT-25_DIODES-INC"
  rect 1x0.7 smd: 1(-1.1,0.95) 2(-1.1,0) 3(-1.1,-0.95) 4(1.1,-0.95) 5(1.1,0.95)
TST_POINT_PTH_20X40MIL_2PIN [mil] "TST_POINT_PTH_20X40MIL_2PIN"
  round 40 hole 20: P$1(0,0) P$2(0,0)
TST_POINT_PTH_042-OCT [mil] "TST_POINT_PTH_042-OCT"
  round 72 hole 42: P$1(0,0)
UBLOX_24LCC [mil] "UBLOX_24LCC"
  rect 70.87x31.5 smd: 1(236.24,-275.75) 2(236.24,-232.45) 3(236.24,-189.14) 4(236.24,-145.83) 5(236.24,-102.53) 6(236.24,-59.22) 7(236.24,-15.91) 8(236.24,102.2) 9(236.24,145.51) 10(236.24,188.81) 11(236.24,232.12) 12(236.24,275.43) 13(-236.24,275.75) 14(-236.24,232.45) 15(-236.24,189.14) 16(-236.24,145.83) 17(-236.24,102.53) 18(-236.24,-15.58) 19(-236.24,-58.89) 20(-236.24,-102.2) 21(-236.24,-145.51) 22(-236.24,-188.81) 23(-236.24,-232.12) 24(-236.24,-275.43)
VQFN100_KDX_MCH [mil] "VQFN100_KDX_MCH"
  rrect50% 40x8 smd: 1(-228,188.98) 25(-228,-188.98) 51(228,-188.98) 75(228,188.98)
  rect 40x8 smd: 2(-228,173.23) 3(-228,157.48) 4(-228,141.73) 5(-228,125.98) 6(-228,110.24) 7(-228,94.49) 8(-228,78.74) 9(-228,62.99) 10(-228,47.24) 11(-228,31.5) 12(-228,15.75) 13(-228,0) 14(-228,-15.75) 15(-228,-31.5) 16(-228,-47.24) 17(-228,-62.99) 18(-228,-78.74) 19(-228,-94.49) 20(-228,-110.24) 21(-228,-125.98) 22(-228,-141.73) 23(-228,-157.48) 24(-228,-173.23) 52(228,-173.23) 53(228,-157.48) 54(228,-141.73) 55(228,-125.98) 56(228,-110.24) 57(228,-94.49) 58(228,-78.74) 59(228,-62.99) 60(228,-47.24) 61(228,-31.5) 62(228,-15.75) 63(228,0) 64(228,15.75) 65(228,31.5) 66(228,47.24) 67(228,62.99) 68(228,78.74) 69(228,94.49) 70(228,110.24) 71(228,125.98) 72(228,141.73) 73(228,157.48) 74(228,173.23)
  rrect50% 8x40 smd: 26(-188.98,-228) 50(188.98,-228) 76(188.98,228) 100(-188.98,228)
  rect 8x40 smd: 27(-173.23,-228) 28(-157.48,-228) 29(-141.73,-228) 30(-125.98,-228) 31(-110.24,-228) 32(-94.49,-228) 33(-78.74,-228) 34(-62.99,-228) 35(-47.24,-228) 36(-31.5,-228) 37(-15.75,-228) 38(0,-228) 39(15.75,-228) 40(31.5,-228) 41(47.24,-228) 42(62.99,-228) 43(78.74,-228) 44(94.49,-228) 45(110.24,-228) 46(125.98,-228) 47(141.73,-228) 48(157.48,-228) 49(173.23,-228) 77(173.23,228) 78(157.48,228) 79(141.73,228) 80(125.98,228) 81(110.24,228) 82(94.49,228) 83(78.74,228) 84(62.99,228) 85(47.24,228) 86(31.5,228) 87(15.75,228) 88(0,228) 89(-15.75,228) 90(-31.5,228) 91(-47.24,228) 92(-62.99,228) 93(-78.74,228) 94(-94.49,228) 95(-110.24,228) 96(-125.98,228) 97(-141.73,228) 98(-157.48,228) 99(-173.23,228)
  rect 319x319 smd paste+0: 101(0,0)

## Part data
1V2 3V3 5V 5VIN 5VMB !GNSSPWREN !GNSSVBEN !URST !VB1FLT !VB2FLT !VB3FLT !VB4FLT -5VMB ATEST GND GNSS3V3 GNSSGND GNSSINT GNSSPLS GNSSRX GNSSTX GNSSVDDU MBPWREN PCVBUS PIC_RA1 PIC_RA4 PIC_RA5 PIC_RC1 PIC_RE2 PIC_RE3 PIC_RE4 PIC_RF4 PIC_RF5 PIC_RF6 TEMP_5V TMPWREN VBUS1 VBUS2 VBUS3 VBUS4: library part TST_POINT_PTH_042-OCT, PackageName=TST_POINT_PTH_042-OCT
5V_ON: library part LED_0603_LITE-ON, PackageName=LED_0603_LITE-ON
!GNSSRES !HUBRES ANEXTEMP GNSSANTDET GNSSANTOK RXD1 RXD2 SCK1 SCK2 SDI1 SDI2 SDO1 SDO2 SS1 SS1AUX SS2 SS2AUX TXD1 TXD2: library part TST_POINT_PTH_20X40MIL_2PIN, PackageName=TST_POINT_PTH_20X40MIL_2PIN
C1 C2 C3 C4 C5 C6 C7 C8 C9 C11 C12 C13 C14 C15 C16 C17 C18 C19 C20 C21 C22 C23 C24 C25 C28 C29 C30 C31 C33 C34 C35 C36 C37 C38 C39 C40 C41 C42 C43 C44 C45 C46 C47 C48 C49 C50 C53 C54 C55 C58 C59 C60 C61 C62 C63 C64 C65 C66 C67 C68 C69 C71 C72 C73 C74 C75 C76 C78 C81: library part G-155_MUR, PackageName=G-155_MUR
C10 C26 C27 C32 C51 C52 C56 C70 C77 C79 C80: library part CAP_C1608_TDK, PackageName=CAP_C1608_TDK
CR1: library part SOD-923F_COMCHIP, PackageName=SOD-923F_COMCHIP
GNSSPULSE: library part LED_DIALIGHT_598_DIA, PackageName=LED_DIALIGHT_598_DIA
J1: library part CON_1053131306, PackageName=CON_1053131306
J2: library part CON_1053141310, PackageName=CON_1053141310
J3: library part CON_1053131303, PackageName=CON_1053131303
J4: library part 3M_N3314-5302RB_RA, PackageName=3M_N3314-5302RB_RA
J5: library part SAMTEC_SMA-J-P-X-ST-TH1, PackageName=SAMTEC_SMA-J-P-X-ST-TH1
J6: library part CON_1053131304, PackageName=CON_1053131304
J7 J8 J9: library part CON_1054301305_MOL, PackageName=CON_1054301305_MOL
J10 J11: library part MOLEX_VERT-HDR_171861004, PackageName=MOLEX_VERT-HDR_171861004
J12: library part CONN_GRPB031VWVN-RC_SUL, PackageName=CONN_GRPB031VWVN-RC_SUL
L1: library part IND_TAIYO_NR3012_TAY, PackageName=IND_TAIYO_NR3012_TAY
L2: library part INDUCTOR_0603_TDK, PackageName=INDUCTOR_0603_TDK
PK3: library part CON_901311086_MOL, PackageName=CON_901311086_MOL
PTH1 PTH2 PTH3 PTH4: library part PTH_M4_4.5MM-ID, PackageName=PTH_M4_4.5MM-ID
Q1 Q5: library part SO-8L-NB_FAS, PackageName=SO-8L-NB_FAS
Q2 Q4 Q6 Q7 Q8: library part SC-75(SOT-416)_ONSEMI, PackageName=SC-75(SOT-416)_ONSEMI
Q3: library part SOT_1CDS-T1-BE3_VIS, PackageName=SOT_1CDS-T1-BE3_VIS
R1 R2 R3 R4 R5 R6 R7 R8 R9 R10 R11 R12 R13 R14 R15 R16 R17 R18 R19 R20 R21 R22 R23 R24 R25 R26 R27 R28 R29 R30 R31 R32 R33 R34 R35 R36 R37 R38 R39 R40 R41 R42 R43 R44 R45 R46 R47 R48 R49 R50 R51 R56 R58: library part RESC1005X35N, PackageName=RESC1005X35N
R52 R53 R54 R55: library part STA_HCJ0805_STP, PackageName=STA_HCJ0805_STP
R57: library part STA_RMCF0603_STP, PackageName=STA_RMCF0603_STP
U1 U14 U15: library part DBV0005A_L, PackageName=DBV0005A_L
U2: library part DBV5_TEX, PackageName=DBV5_TEX
U3 U7 U8 U9: library part SOT-23-6_AOS, PackageName=SOT-23-6_AOS
U4: library part 21-0061L_MXM, PackageName=21-0061L_MXM
U5: library part SOIC127P600X175-8N, PackageName=SOIC127P600X175-8N
U6: library part 21-0041B_14_MXM, PackageName=21-0041B_14_MXM
U10 U11 U12 U13: library part TSOT-25_DIODES-INC, PackageName=TSOT-25_DIODES-INC
U16: library part UBLOX_24LCC, PackageName=UBLOX_24LCC
U17: library part TQFP64_10X10MC_MCH, PackageName=TQFP64_10X10MC_MCH
U18: library part SOT-23_M3_MCH, PackageName=SOT-23_M3_MCH
U19: library part VQFN100_KDX_MCH, PackageName=VQFN100_KDX_MCH
Y1: library part OSC_ECS-2033-250-BN, PackageName=OSC_ECS-2033-250-BN

## Via types
v1: diameter 26/26/26/26 (per signal layer), hole 10, Top to Bottom, 190 vias
v2: diameter 24/24/24/24 (per signal layer), hole 8, Top to Bottom, 54 vias
v3: diameter 34/30/30/34 (per signal layer), hole 14, Top to Bottom, 29 vias
v4: diameter 40/36/36/40 (per signal layer), hole 20, Top to Bottom, 4 vias

## Nets (pads, with @x,y where several pads share a name; then routed paths per layer and width w, separated by ;. In a path a pad name is that pad's centre, name@x,y a point inside that pad or via, vN(x,y) a via of type N, cw(c..) or ccw(c..) an arc to the next point about the centre after c; other vN are vias at no path point)
1.2V: 1V2.P$1 C25.1 C28.1 C29.1 C30.1 C31.1 C35.1 C36.1 C37.1 C38.1 C39.1 C40.1 C41.1 C42.1 C45.1 C46.1 C47.1 C48.1 C53.1 C55.1 C80.1 L1.1 U2.4 U19.9 U19.18 U19.25 U19.33 U19.41 U19.55 U19.78 U19.83 U19.93 | length 2842.8
  Top w6: v2(1879,2692) 1887,2684 1906,2684 1928.74,2661.26 U19.18@1952,2661.26 ; v1(1908,2803) U19.9@1952,2802.99 ; v1(1920,2506) 1920,2546 1925.02,2551.02 U19.25@1952,2551.02 ; U19.93@2100.5,2968 U19.93@2101.26,2968 2102,2968 2102,2997 2113,3008 v2(2125,3008) ; U19.33@2101.26,2512 2101.26,2543.26 2110,2552 v2(2123,2552) ; v1(2227,2469) 2227,2470.24 U19.41@2227.24,2512 ; U19.83@2258.74,2968 2258.74,3062.24 C55.1@2260,3063.5 ; U19.78@2337.48,2968 2337.48,2999.48 2354,3016 2354,3074.5 C47.1@2345,3083.5 ; U19.55@2408,2614.02 2453.02,2614.02 v1(2460,2614)
  Top w10: v1(2044,2330) 2044,2422 2059.5,2437.5 C53.1@2100,2437.5 ; C29.1@2390,3083.5 2421.5,3083.5 2430,3092 v1(2430,3120) ; L1.1@2800,2236.75 L1.1@2796.75,2240 L1.1@2802.6,2240 ; U2.4@2801.35,2345 U2.4@2802.6,2346.25 ; 1V2.P$1@2840,2115 1V2.P$1@2840,2120
  Top w12: C55.1@2260,3063.5 C25.1@2300,3063.5 2325,3063.5 C47.1@2345,3083.5 C29.1@2390,3083.5 ; C80.1@2730,2350.47 2774.53,2350.47 2780,2345 U2.4@2801.35,2345 ; L1.1@2800,2236.75 2800,2160 1V2.P$1@2840,2120 ; L1.1@2802.6,2240 U2.4@2802.6,2346.25
  Bottom w6: C46.1@1876,2760 1876,2746 1863,2733 1879,2716 v2(1879,2692) ; 2100,2530 2101,2530 ; C37.1@2138,3126.5 C37.1@2140,3128.5
  Bottom w8: v2(1879,2692) 1879,2660.5 C35.1@1881.5,2660 ; v2(2125,3008) 2138,3021 C37.1@2138,3126.5 ; C37.1@2140,3128.5 2151.5,3140 v1(2174,3140)
  Bottom w10: v1(1785,2470) 1784.81,2469.93 1806.74,2448 1858,2448 1881.5,2471.5 C41.1@1881.5,2505 ; v2(1786,2733) 1863,2733 ; C46.1@1876,2760 C46.1@1876.5,2760 C30.1@1876.5,2805 1876.5,2803.5 1878,2803 v1(1908,2803) ; C36.1@1881.5,2550 C41.1@1881.5,2505 ; C42.1@1881.5,2615 C35.1@1881.5,2660 ; v1(1920,2506) 1882.5,2506 C41.1@1881.5,2505 ; v1(2044,2330) 2044,2428 2053.5,2437.5 C39.1@2080,2437.5 ; 2100,2530 2080,2510 C39.1@2080,2437.5 ; 2101,2530 v2(2123,2552) ; v1(2227,2469) 2227,2437 C28.1@2232,2437.5 C48.1@2190,2437.5 C38.1@2125,2437.5 C39.1@2080,2437.5 ; v1(2460,2614) 2483.5,2614 ; C45.1@2500,2614 2483.5,2614 ; v1(2670,2690) 2510,2690 2498.5,2678.5 C31.1@2498.5,2660 C45.1@2498.5,2615 2483.5,2614
  Bottom w12: C40.1@2095,3128.5 C37.1@2140,3128.5
3.3V: 3V3.P$1 C4.1 C5.1 C6.1 C7.1 C8.1 C9.1 C14.1 C15.1 C16.1 C17.1 C18.1 C21.1 C22.1 C23.1 C24.1 C44.1 C49.1 C73.1 C81.1 R16.1 R17.1 R19.1 R20.1 R24.1 R42.1 U1.5 U18.3 U19.26 U19.44 U19.53 U19.62 U19.67 U19.79 U19.86 U19.99 Y1.1 Y1.4 | length 2068.1
  Top w6: U19.26@1991.02,2512 1991.02,2544.02 v2(2000,2553) ; v2(1992,3016) 2006,3006 2006,2968.77 U19.99@2006.77,2968 ; 2095.43,3143.93 C49.1@2101.5,3160 ; U19.86@2211.5,2968 2211.5,2930.5 v2(2212,2931) ; v1(2274,2470) 2274.49,2470.49 U19.44@2274.49,2512 ; U19.79@2321.73,2968 2321.73,3003.73 2328,3010 v1(2328,3028) ; U19.53@2408,2582.52 2447.48,2582.52 v1(2460,2570) ; U19.62@2408,2724.25 2445.75,2724.25 v1(2454,2717) ; U19.67@2408,2802.99 2439.01,2802.99 v1(2446,2803)
  Top w8: U18.3@1810,3094 1928,3094 1940,3082 1940,3039 1934,3033 1912.13,3033 R42.1@1912,3032.87 ; R24.1@1881.13,2661 1904,2661 1912,2653 v2(1912,2640)
  Top w10: v1(1912,3004) R42.1@1912,3032.87 ; v1(1935,2437) 1956.5,2437.5 C44.1@1985,2437.5 ; R20.1@2527.13,2730 R16.1@2527.13,2775 R19.1@2527.13,2820 R17.1@2527.13,2865 2531,2864.87 2531,2881 v2(2547,2897) ; C73.1@3257.4,2290.9 C73.1@3256.5,2290 C73.1@3260,2290 ; U1.5@3257.4,2348.82 U1.5@3260,2345
  Top w12: v2(2093.5,3020.5) 2093.5,3051.5 2094.5,3052.5 2097.56,3052.44 Y1.4@2095.43,3052.44 Y1.1@2095.43,3107.56 2095.43,3143.93 ; C73.1@3257.4,2290.9 U1.5@3257.4,2348.82 ; 3V3.P$1@3260,2110 C73.1@3260,2290
  Bottom w6: v2(1992,3016) 1992,3036 1999.5,3043.5 C5.1@2000,3043.5 ; C21.1@2297.5,2440 C21.1@2300,2437.5
  Bottom w8: v1(2446,2803) 2458,2815 C15.1@2498.5,2815 C18.1@2498.5,2860 ; v1(2454,2717) 2462,2725 C14.1@2498.5,2725 C17.1@2498.5,2770 ; C9.1@2498.5,2525 C6.1@2498.5,2570
  Bottom w10: v1(1935,2437) 1954.5,2437.5 C4.1@1965,2437.5 C7.1@2010,2437.5 ; C5.1@2000,3043.5 C8.1@2045,3043.5 2072.5,3043.5 v2(2093.5,3020.5) ; v1(2274,2470) 2274,2446 2280,2440 C21.1@2297.5,2440 ; C21.1@2300,2437.5 C81.1@2344,2437.5 ; v1(2460,2570) C6.1@2498.5,2570
  Bottom w12: C24.1@2180,3063.5 C22.1@2230,3063.5 C23.1@2280,3063.5 C16.1@2330,3063.5 2330.5,3063.5 2328,3064 v1(2328,3028)
3V3_EN: R30.2 U17.39 | length 2123.2
  Top w8: U17.39@1451,2710.47 1528.53,2710.47 1606,2633 1606,2342 1671,2277 2521,2277 2784,2540 3072.87,2540 R30.2@3102.87,2510
5V: 5V.P$1 C1.1 C2.1 C10.1 C11.1 C12.1 C27.1 C33.1 C34.1 C50.1 C58.1 C62.1 C71.1 C72.1 C74.1 C75.1 C77.1 C78.1 C79.1 PK3.4 Q1.1 Q1.2 Q1.3 Q3.2 Q5.1 Q5.2 Q5.3 R4.1 R5.2 R6.2 R8.2 R13.1 R26.2 R27.2 R28.2 R29.1 R38.2 R44.2 R56.2 R58.1 U1.1 U2.1 U2.3 U4.1 U6.4 U6.14 U10.4 U11.4 U12.4 U13.4 U14.1 U17.10 U17.19 U17.26 U17.38 U17.57 | length 4890.3
  Top w8: 970,2710 1008.53,2710 U17.10@1009,2710.47 ; v2(1026,3166) R44.2@1026,3193.87 ; U17.19@1121.73,2519 1121.73,2567.73 v1(1122,2568) ; v1(1220,3009) 1220.16,3008.84 U17.57@1220.16,2961 ; U17.26@1259.53,2519 1259.53,2569.53 1270,2580 v1(1290,2580) ; v1(1390,2700) 1399.21,2690.79 U17.38@1451,2690.79 ; U1.1@3257.4,2451.18 U1.1@3258.58,2450
  Top w10: C71.1@355,1613.5 404.41,1613.5 U10.4@412.6,1621.69 ; v1(412,1584) 426,1570 R58.1@456.87,1570 ; R4.1@852.87,2770 852.87,2751.13 865,2739 865,2724.53 C10.1@879.53,2710 879.53,2678.03 C2.1@856.5,2655 ; U4.1@906.75,3250.63 906.75,3196.75 C12.1@907.5,3196 ; Q3.2@1097.4,3580 1097.4,3561.6 1102,3557 1102,3526.5 C75.1@1108.5,3520 ; C50.1@1260,1326.5 1283,1350 v1(1283,1365) ; R6.2@1260,1437.13 v1(1260,1471) ; R13.1@1527.13,980 1545,962.13 1545,950 ; R27.2@1532.13,3435 1532.13,3480.63 C58.1@1533.5,3480 1533,3480.5 1533,3507 1540,3514 v1(1560,3514) ; R28.2@2027.13,3335 2031.5,3339.37 C62.1@2031.5,3385 2054,3385 2060,3391 v1(2060,3410) ; U6.4@2030,897.25 U6.4@2030,920 ; C34.1@2245,723.5 C34.1@2246.5,723 ; R26.2@2332.13,3435 2332.13,3483.63 C33.1@2333.5,3485 2334,3485.5 2334,3511 2343,3520 v1(2367,3520) ; U2.3@2802.6,2453.75 2802.6,2425.4 2813,2415 2867,2415 2878,2426 2878,2453.15 U2.1@2877.4,2453.75 ; 5V.P$1@3089.76,2910 5V.P$1@3090,2920 ; U1.1@3257.4,2451.18 U1.1@3261.5,2455.28 ; U1.1@3258.58,2450 3315,2450 3350,2415 3350,2050 3380,2020 R56.2@3517.87,2020
  Top w12: PK3.4@163,2850 650,2850 718,2782 747,2782 759,2770 R4.1@852.87,2770 ; R38.2@410,1822.13 439.87,1822.13 v1(442,1822) ; v1(412,1584) 412.6,1586.6 U10.4@412.6,1621.69 ; v1(877,3196) C12.1@907.5,3196 ; C10.1@879.53,2710 v1(920,2710) 970,2710 ; R5.2@1057.13,3520 C75.1@1108.5,3520 ; Q3.2@1097.4,3580 1104.4,3573 v1(1130,3573) ; v1(1191,3099) 1192,3100 C27.1@1230.47,3100 1230,3100.47 1230,3135 1248.5,3153.5 C11.1@1248.5,3155 ; U14.1@1201.18,1327.6 1258.9,1327.6 C50.1@1260,1326.5 ; U12.4@1558.31,3547.6 1560,3545.91 v1(1560,3514) ; U6.4@2030,920 v1(2030,943) ; U13.4@2053.31,3442.6 2064,3442.6 2060,3442 v1(2060,3410) ; U6.14@2180,682.75 2230.75,682.75 2244,696 2244,722.5 C34.1@2245,723.5 ; C34.1@2246.5,723 v1(2279,723) ; U11.4@2358.31,3547.6 2367,3538.91 v1(2367,3520) ; U2.1@2877.4,2453.75 2877.5,2453.85 2877.5,2508.85 C74.1@2881.5,2510 v1(2912,2510) 2912,2508 2960,2460 R29.1@3102.87,2460 ; R8.2@3007.13,2725 3040,2725 ; U1.1@3257.4,2451.18 3257.4,2505.9 C72.1@3261.5,2510 3290,2510 3304,2524 v1(3304,2624)
  Top w16: Q5.3@1545,900.24 1545,950 1595,950 ; Q5.2@1595,900.24 1595,950 ; Q5.1@1645,900.24 1645,950 ; v3(1690,950) 1645,950 ; 3040,2820 3045,2825 ; 1595,950 1645,950
  Top w20: v3(3004,2825) 3040,2825 3040,2820 3040,2775 ; 3045,2825 Q1.1@3089.76,2825 5V.P$1@3089.76,2910 ; Q1.3@3089.76,2725 3040,2725 3040,2775 ; Q1.2@3089.76,2775 3040,2775
  Bottom w8: C77.1@1350,2700.47 1350.47,2700 v1(1390,2700)
  Bottom w10: C1.1@1300,2718.5 1301.5,2718.5 1307,2713 1337.47,2713 C77.1@1350,2700.47
  Bottom w12: C79.1@1240,2590.47 ccw(c1250.47,2590.47) 1250.47,2580 v1(1290,2580) C78.1@1290,2608.5 ; v1(2912,2510) v1(2912,2626)
5V_MB: 5VMB.P$1 C56.1 J4.3 J4.4 PK3.3 Q5.5 Q5.6 Q5.7 Q5.8 R12.2 U5.1 U5.6 | length 5919.3
  Top w10: Q5.8@1645,679.76 1645.24,680 1710,680 1720,690 C56.1@1720,730.47 ; 5VMB.P$1@2340,1160 2390,1110 2580,1110 2610,1080 U5.1@2610,887.44 U5.1@2612.56,890 ; R12.2@2673.87,777 R12.2@2675,777.13
  Top w12: v3(2510,620) U5.6@2510,692.56 2510,767 2520,777 R12.2@2673.87,777 ; U5.1@2612.56,890 2660,890 2675,875 R12.2@2675,777.13
  Top w16: Q5.5@1495,679.76 1495,635 1545,635 ; Q5.6@1545,679.76 1545,635 ; Q5.8@1645,679.76 1645,635 1640,635 ; v3(1650,590) 1650,625 1640,635 ; 1545,635 1596,635 1596,679.76 Q5.7@1595,679.76 1595,635 1640,635
  PWR+Signal w10: v1(700,2690) 700,2080 1210,1570 1930,1570 5VMB.P$1@2340,1160
  PWR+Signal w16: v3(1650,590) 1677,564 v1(2125,564) J4.3@2125,500
  Bottom w10: PK3.3@63,2850 113,2800 520,2800 630,2690 v1(700,2690)
  Bottom w16: J4.4@2125,400 J4.3@2125,500 ; v1(2125,564) 2125,565 2180,620 v3(2510,620)
!GNSS_PWR_EN: !GNSSPWREN.P$1 R35.1 U17.22 | length 1375.2
  Top w8: U17.22@1180.79,2519 1180.79,2475.21 1190,2466 1190,1928 1570,1548 R35.1@1570,1397.13
  Top w10: R35.1@1570,1397.13 1591.87,1397.13 1609,1380 !GNSSPWREN.P$1@1655,1380
!GNSS_RES: !GNSSRES.P$1 !GNSSRES.P$2 R7.1 U16.8 U17.17 | length 1980.1
  Top w8: v1(353,1043) 353.87,1042.87 R7.1@386,1042.87 ; !GNSSRES.P$2@1025,2365 1060,2365 1080,2385 ; v1(1080,1820) 1080,2385 ; U17.17@1082.36,2519 1082.36,2480 1082,2480 1080,2478 1080,2385
  Top w10: R7.1@386,1042.87 386,1021 399,1008 463.56,1008 U16.8@463.76,1007.8
  Bottom w8: v1(353,1043) 352.5,1043.5 352.5,1092.5 v1(1080,1820)
!GNSS_VBUS_EN: !GNSSVBEN.P$1 R11.1 U17.15 | length 1286.3
  Top w8: !GNSSVBEN.P$1@710,1880 944,2110 944,2600 956,2612 U17.15@1009,2612.05 U17.15@1009,2612.05
  Top w10: R11.1@355,1822.13 355,1855 380,1880 !GNSSVBEN.P$1@710,1880
!HUB_RES: !HUBRES.P$1 !HUBRES.P$2 R36.1 U17.48 | length 652.8
  Top w8: v1(1405,2895) 1412.36,2887.64 U17.48@1451,2887.64 1470,2887.64 1470,3054 1482,3066 1508.87,3066 R36.1@1510,3067.13
  GND+Signal w8: v1(1405,2895) 1520,3010 1520,3185 !HUBRES.P$2@1545,3210
!SPI1_SS: J1.3 SS1.P$1 SS1.P$2 U17.11 | length 3072.9
  Top w8: U17.11@1009,2690.79 1090.79,2690.79
  Top w10: SS1.P$2@1025,2450 1025,2535 1070,2580 1070,2670 1090.79,2690.79 v1(1120,2720)
  GND+Signal w10: v1(1120,2720) 1150,2720 1180,2690 1340,2690 1360,2670 1510,2670 v1(1520,2680)
  Bottom w10: v1(1520,2680) 1540,2680 1599,2621 1598,2538 1834,2302 2312,2302 2430,2420 3050,2420 3100,2470 3323,2470 3391,2538 J1.3@3473,2538
!SPI1_SS_AUX: J10.4 SS1AUX.P$1 SS1AUX.P$2 U17.33 | length 1957.1
  Top w8: U17.33@1451,2592.36 1497.64,2592.36 v1(1540,2550)
  Bottom w10: SS1AUX.P$2@245,1740 215,1740 J10.4@135,1820 230,1820 350,1940 930,1940 v1(1540,2550)
!SPI2_SS: R17.2 SS2.P$1 SS2.P$2 U17.49 U19.69 | length 1650.8
  Top w6: U19.69@2408,2834.49 2444.49,2834.49 2472,2862 2489.87,2862 R17.2@2492.87,2865
  Top w8: U17.49@1377.64,2961 1378,2961.36 1378,3004 1508,3134 1735,3134 v1(1774,3096) ; R17.2@2492.87,2865 2492.87,2972.87 2535,3015 2535,3071 SS2.P$2@2560,3096
  PWR+Signal w8: v1(1774,3096) SS2.P$2@2560,3096
!SPI2_SS_AUX: J11.4 SS2AUX.P$2 | length 724.3
  Bottom w10: J11.4@135,3275 136,3270 136,3208 340,3004 549,3004 570,3025 SS2AUX.P$2@700,3025
!URST: !URST.P$1 Q8.3 R42.2 U18.2 U19.1 | length 696.9
  Top w6: 1847.4,2947.4 1855.8,2939 1910,2939 1920,2929 U19.1@1952,2928.98 U19.1@1950.98,2929
  Top w8: 1847.4,2947.4 1847.4,2972 ; U18.2@1847.4,3006 1870,3006 1880,3016 1880,3056 1890,3066 1910.87,3066 R42.2@1912,3067.13
  Top w10: !URST.P$1@1660,2930 1690,2960 1835.4,2960 1847.4,2972 U18.2@1847.4,3006 ; Q8.3@1660,3075.5 1660,3085 v1(1690,3085)
  GND+Signal w10: !URST.P$1@1660,2930 1660,3055 v1(1690,3085)
!VBUS1_FLT: !VB1FLT.P$1 R38.1 U10.3 U17.16 | length 1357
  Top w8: R38.1@410,1787.87 R38.1@410.13,1788 ; !VB1FLT.P$1@710,1770 962,2022 962,2584 970.36,2592.36 U17.16@1009,2592.36
  Top w10: R38.1@410,1787.87 412.6,1785.28 U10.3@412.6,1708.31 ; R38.1@410.13,1788 640,1788 658,1770 !VB1FLT.P$1@710,1770
!VBUS2_FLT: !VB2FLT.P$1 R26.1 U11.3 U17.45 | length 1596.7
  Top w8: U17.45@1451,2828.58 1530,2828.58 1581.42,2880 1720,2880 v1(1770,2930) ; U11.3@2271.69,3547.6 2271.69,3461.18 R26.1@2297.87,3435 2298,3434.87 v1(2298,3400) 2480,3400 !VB2FLT.P$1@2515,3435
  Bottom w10: v1(1770,2930) 1860,3020 1860,3200 1940,3280 1940,3310 1960,3330 2228,3330 v1(2298,3400)
!VBUS3_FLT: !VB3FLT.P$1 R27.1 U12.3 U17.53 | length 681.6
  Top w8: U17.53@1298.9,2961 1298.9,3038.9 1330,3070 1330,3195 !VB3FLT.P$1@1500,3365
  Top w10: U12.3@1471.69,3547.6 1471.69,3461.18 R27.1@1497.87,3435 1497.87,3367.13 !VB3FLT.P$1@1500,3365
!VBUS4_FLT: !VB4FLT.P$1 R28.1 U13.3 U17.44 | length 1017.8
  Top w8: U17.44@1451,2808.9 1540,2808.9 1591.1,2860 1740,2860 1769.1,2889.1 1769.1,2890 v1(1770,2890)
  Top w10: U13.3@1966.69,3442.6 1958,3433.91 1958,3370 1992.87,3335.13 R28.1@1992.87,3335 1995,3332.87 !VB4FLT.P$1@1995,3265
  Bottom w10: v1(1770,2890) 1884,3004 1884,3154 !VB4FLT.P$1@1995,3265
-5V_MB: -5VMB.P$1 C32.1 J4.11 J4.12 R37.2 U5.5 | length 1709.4
  Top w10: -5VMB.P$1@2340,1050 2340,740 2349.53,730.47 C32.1@2385,730.47 2385,701 2393.44,692.56 U5.5@2460,692.56 ; 2460,600 2474,586 R37.2@2542.87,586
  Top w16: v3(2390,580) 2440,580 2460,600 U5.5@2460,692.56
  Bottom w16: J4.11@1725,500 J4.12@1725,400 1785,340 2310,340 2340,370 2340,530 v3(2390,580)
ANA_EXT_TEMP: ANEXTEMP.P$1 ANEXTEMP.P$2 J6.2 R10.1 U17.24 | length 1979.8
  Top w8: U17.24@1220.16,2519 1220.16,2480.84 1240,2461 v2(1240,2435)
  Top w10: v1(850,3430) R10.1@850,3602.87 912.87,3602.87 958,3648 J6.2@958,3770
  GND+Signal w8: v2(1240,2435) 1290,2435 1415,2310 ANEXTEMP.P$2@1415,2280
  Bottom w10: v1(850,3430) 940,3430 1070,3300 1070,3250 1160,3160 1160,2515 v2(1240,2435)
CLK_25MHZ: U19.98 Y1.3 | length 84.6
  Top w6: U19.98@2022.52,2968 2022.52,3040.39 Y1.3@2024.57,3052.44
EXT_TEMP_5V: J6.3 Q3.3 TEMP_5V.P$1 | length 412
  Top w10: v1(1030,3670) 1050,3670 Q3.3@1060,3660 1060,3695 1057,3698 J6.3@1057,3770
  Bottom w12: TEMP_5V.P$1@780,3670 830,3670 850,3650 1010,3650 v1(1030,3670)